# Altium PCB GripperBottomBoard.PcbDoc (part 1 of 4)
Units mm, origin at the board's own origin, x right, y up, seen from the top; angles counter-clockwise.
Board outline 79.5 x 85 mm, 6 copper layers (Top Layer, GND 01, SIG 01, PWR, GND 02, Bottom Layer), stack 1.705 mm thick; 155 components, 93 nets, 613 pads, 240 vias.
Unrouted connection lines stored in the file: 155.
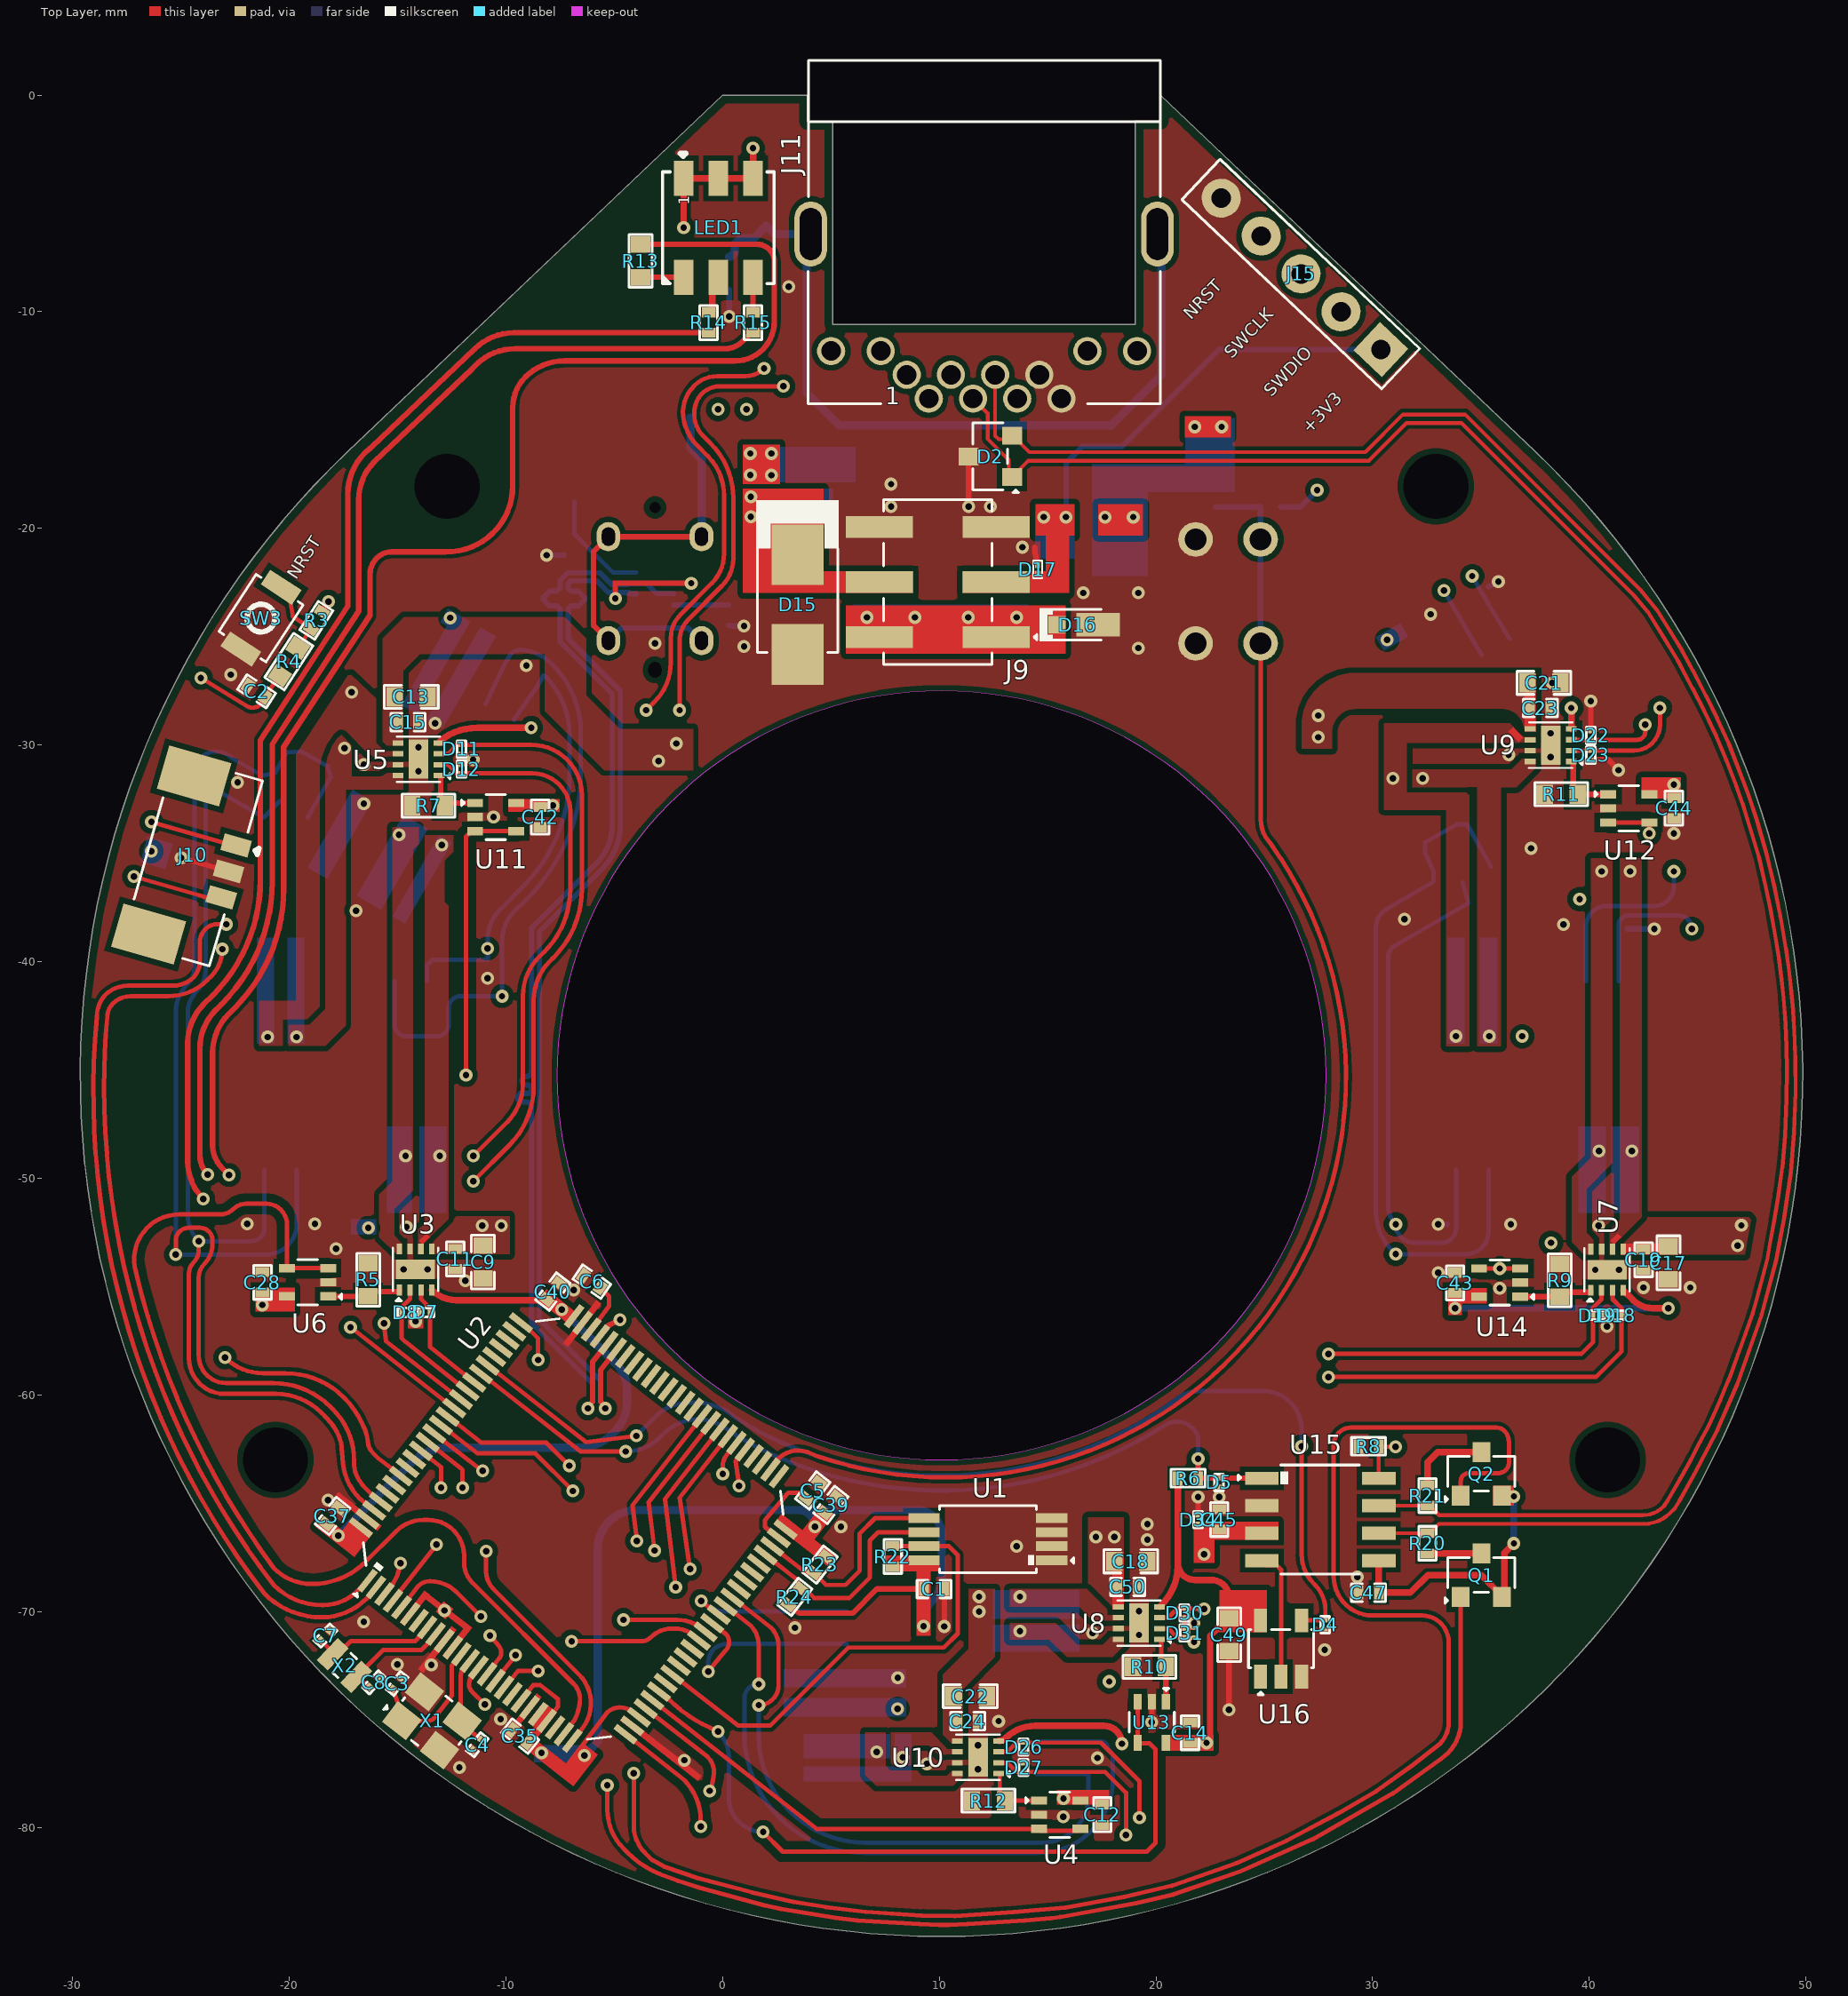
[diagram p0: Top Layer view]
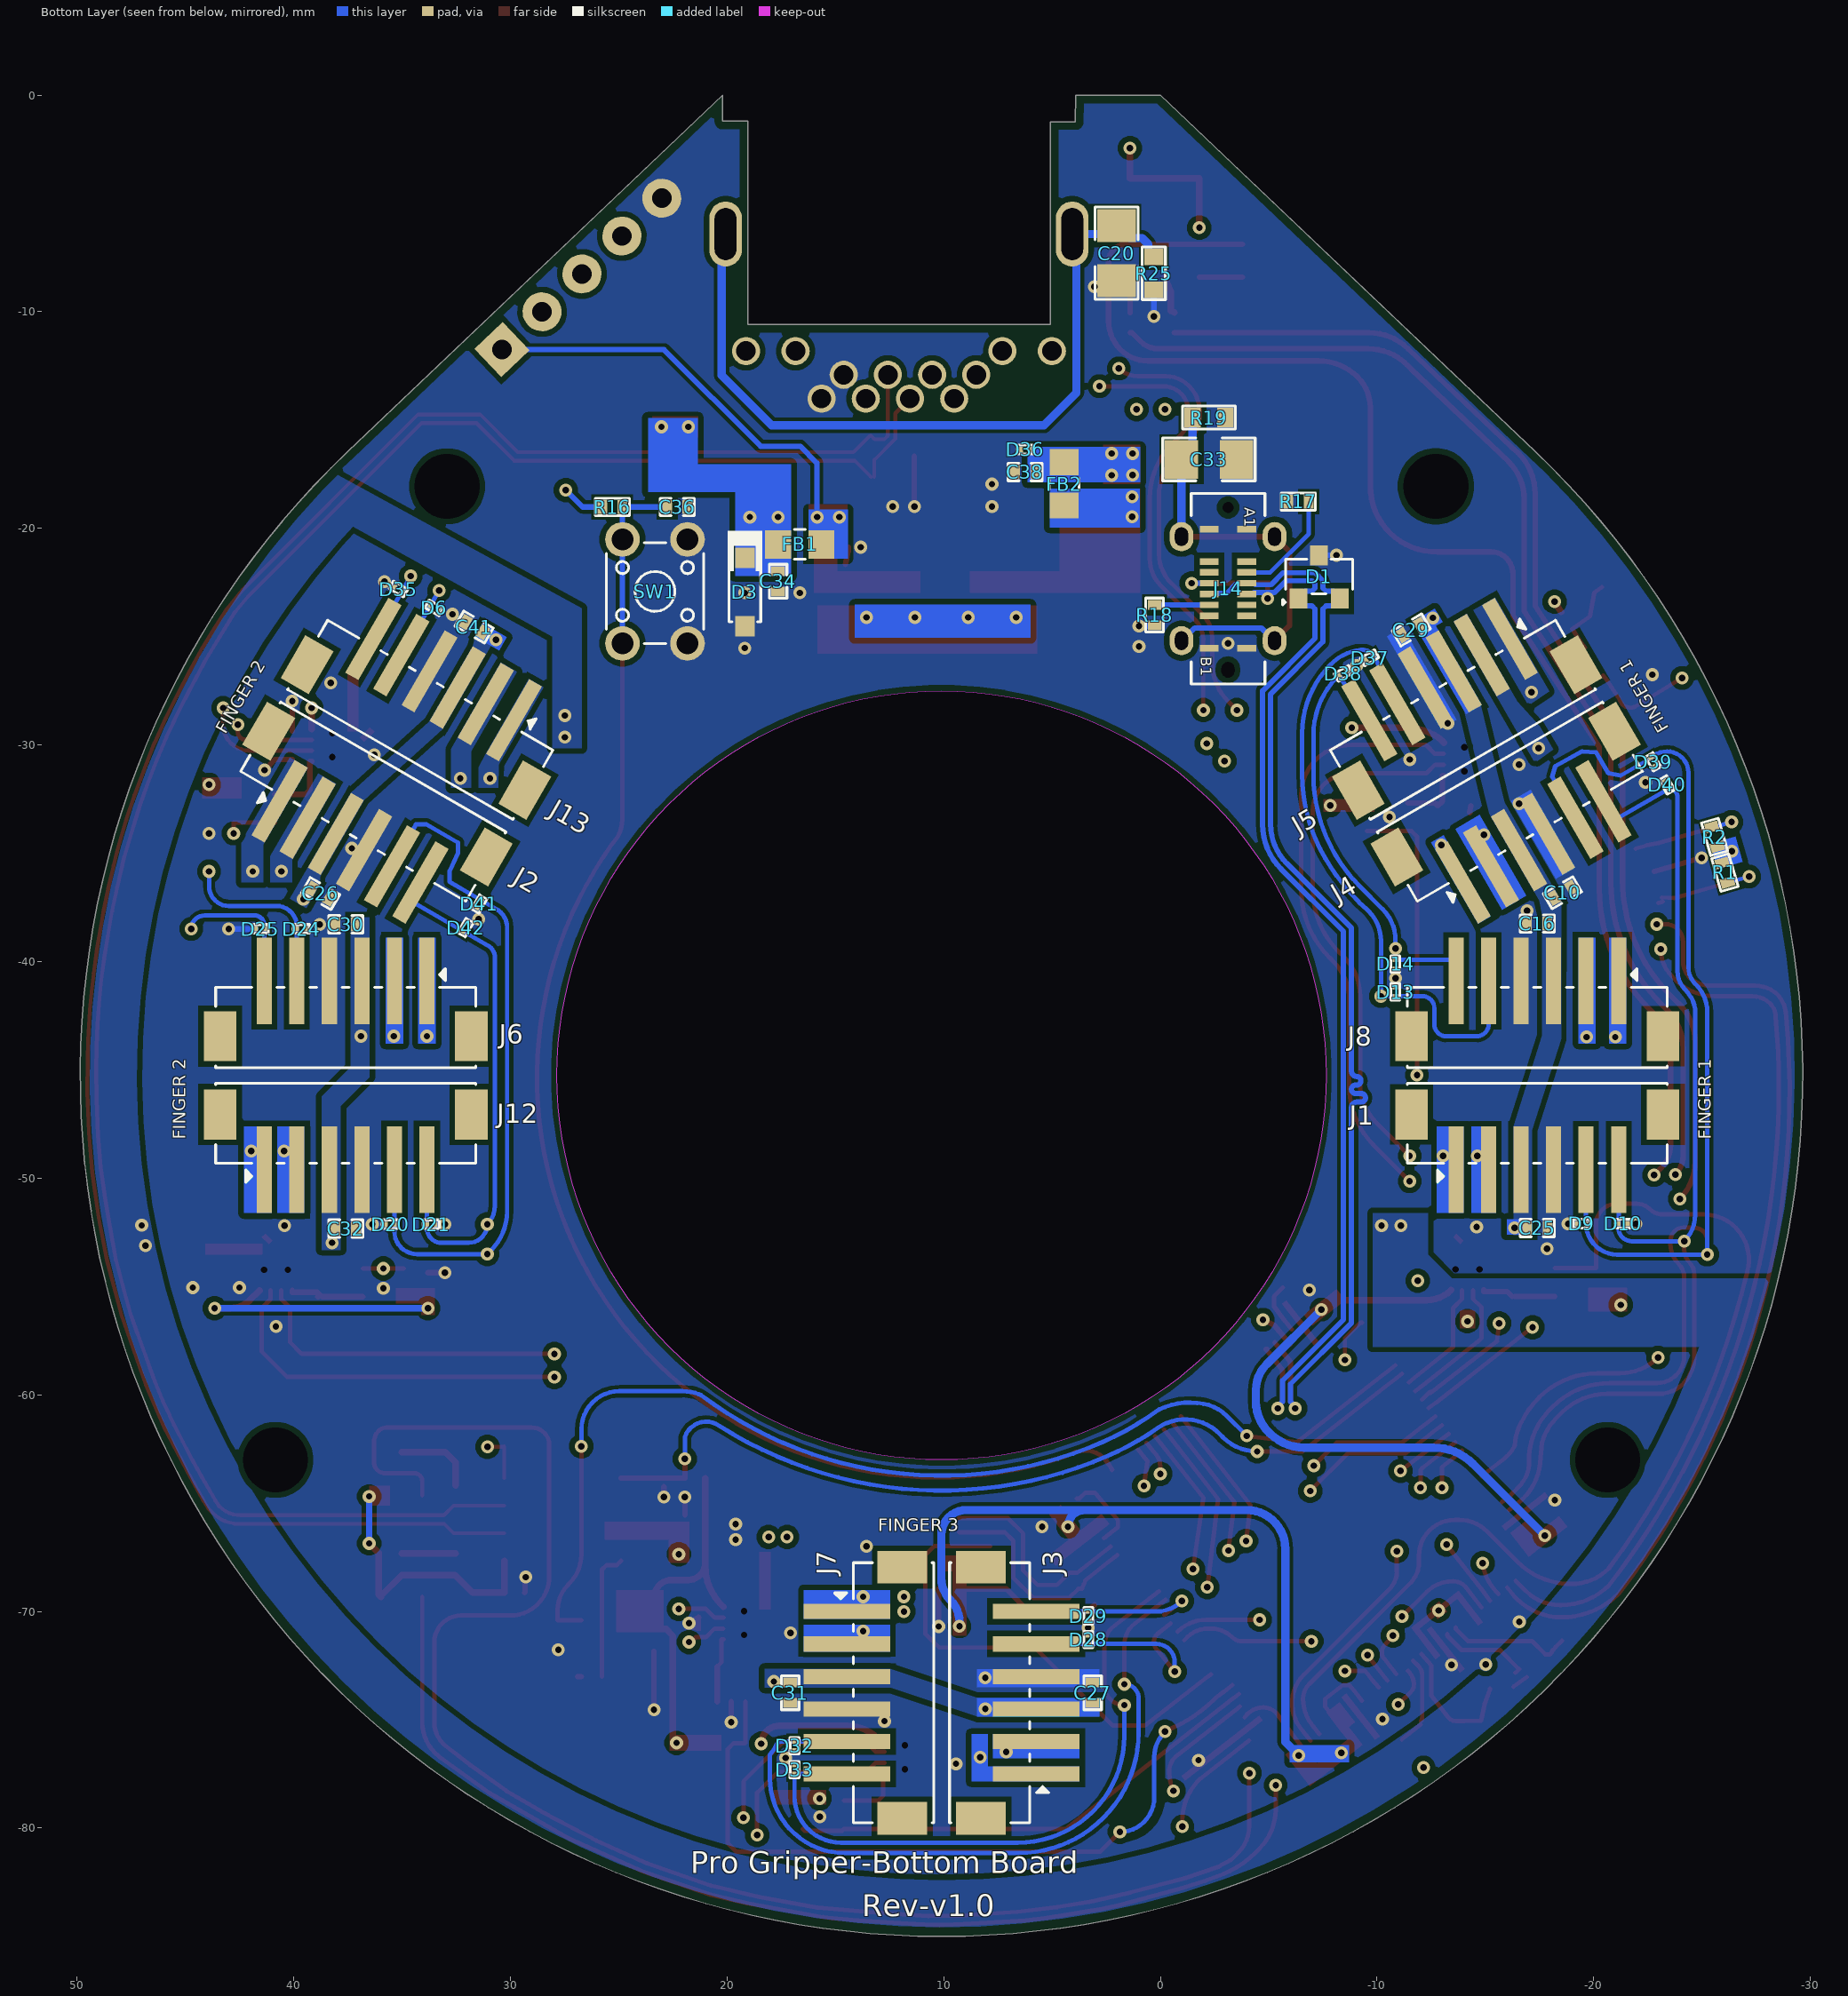
[diagram p1: Bottom Layer view, seen from below]
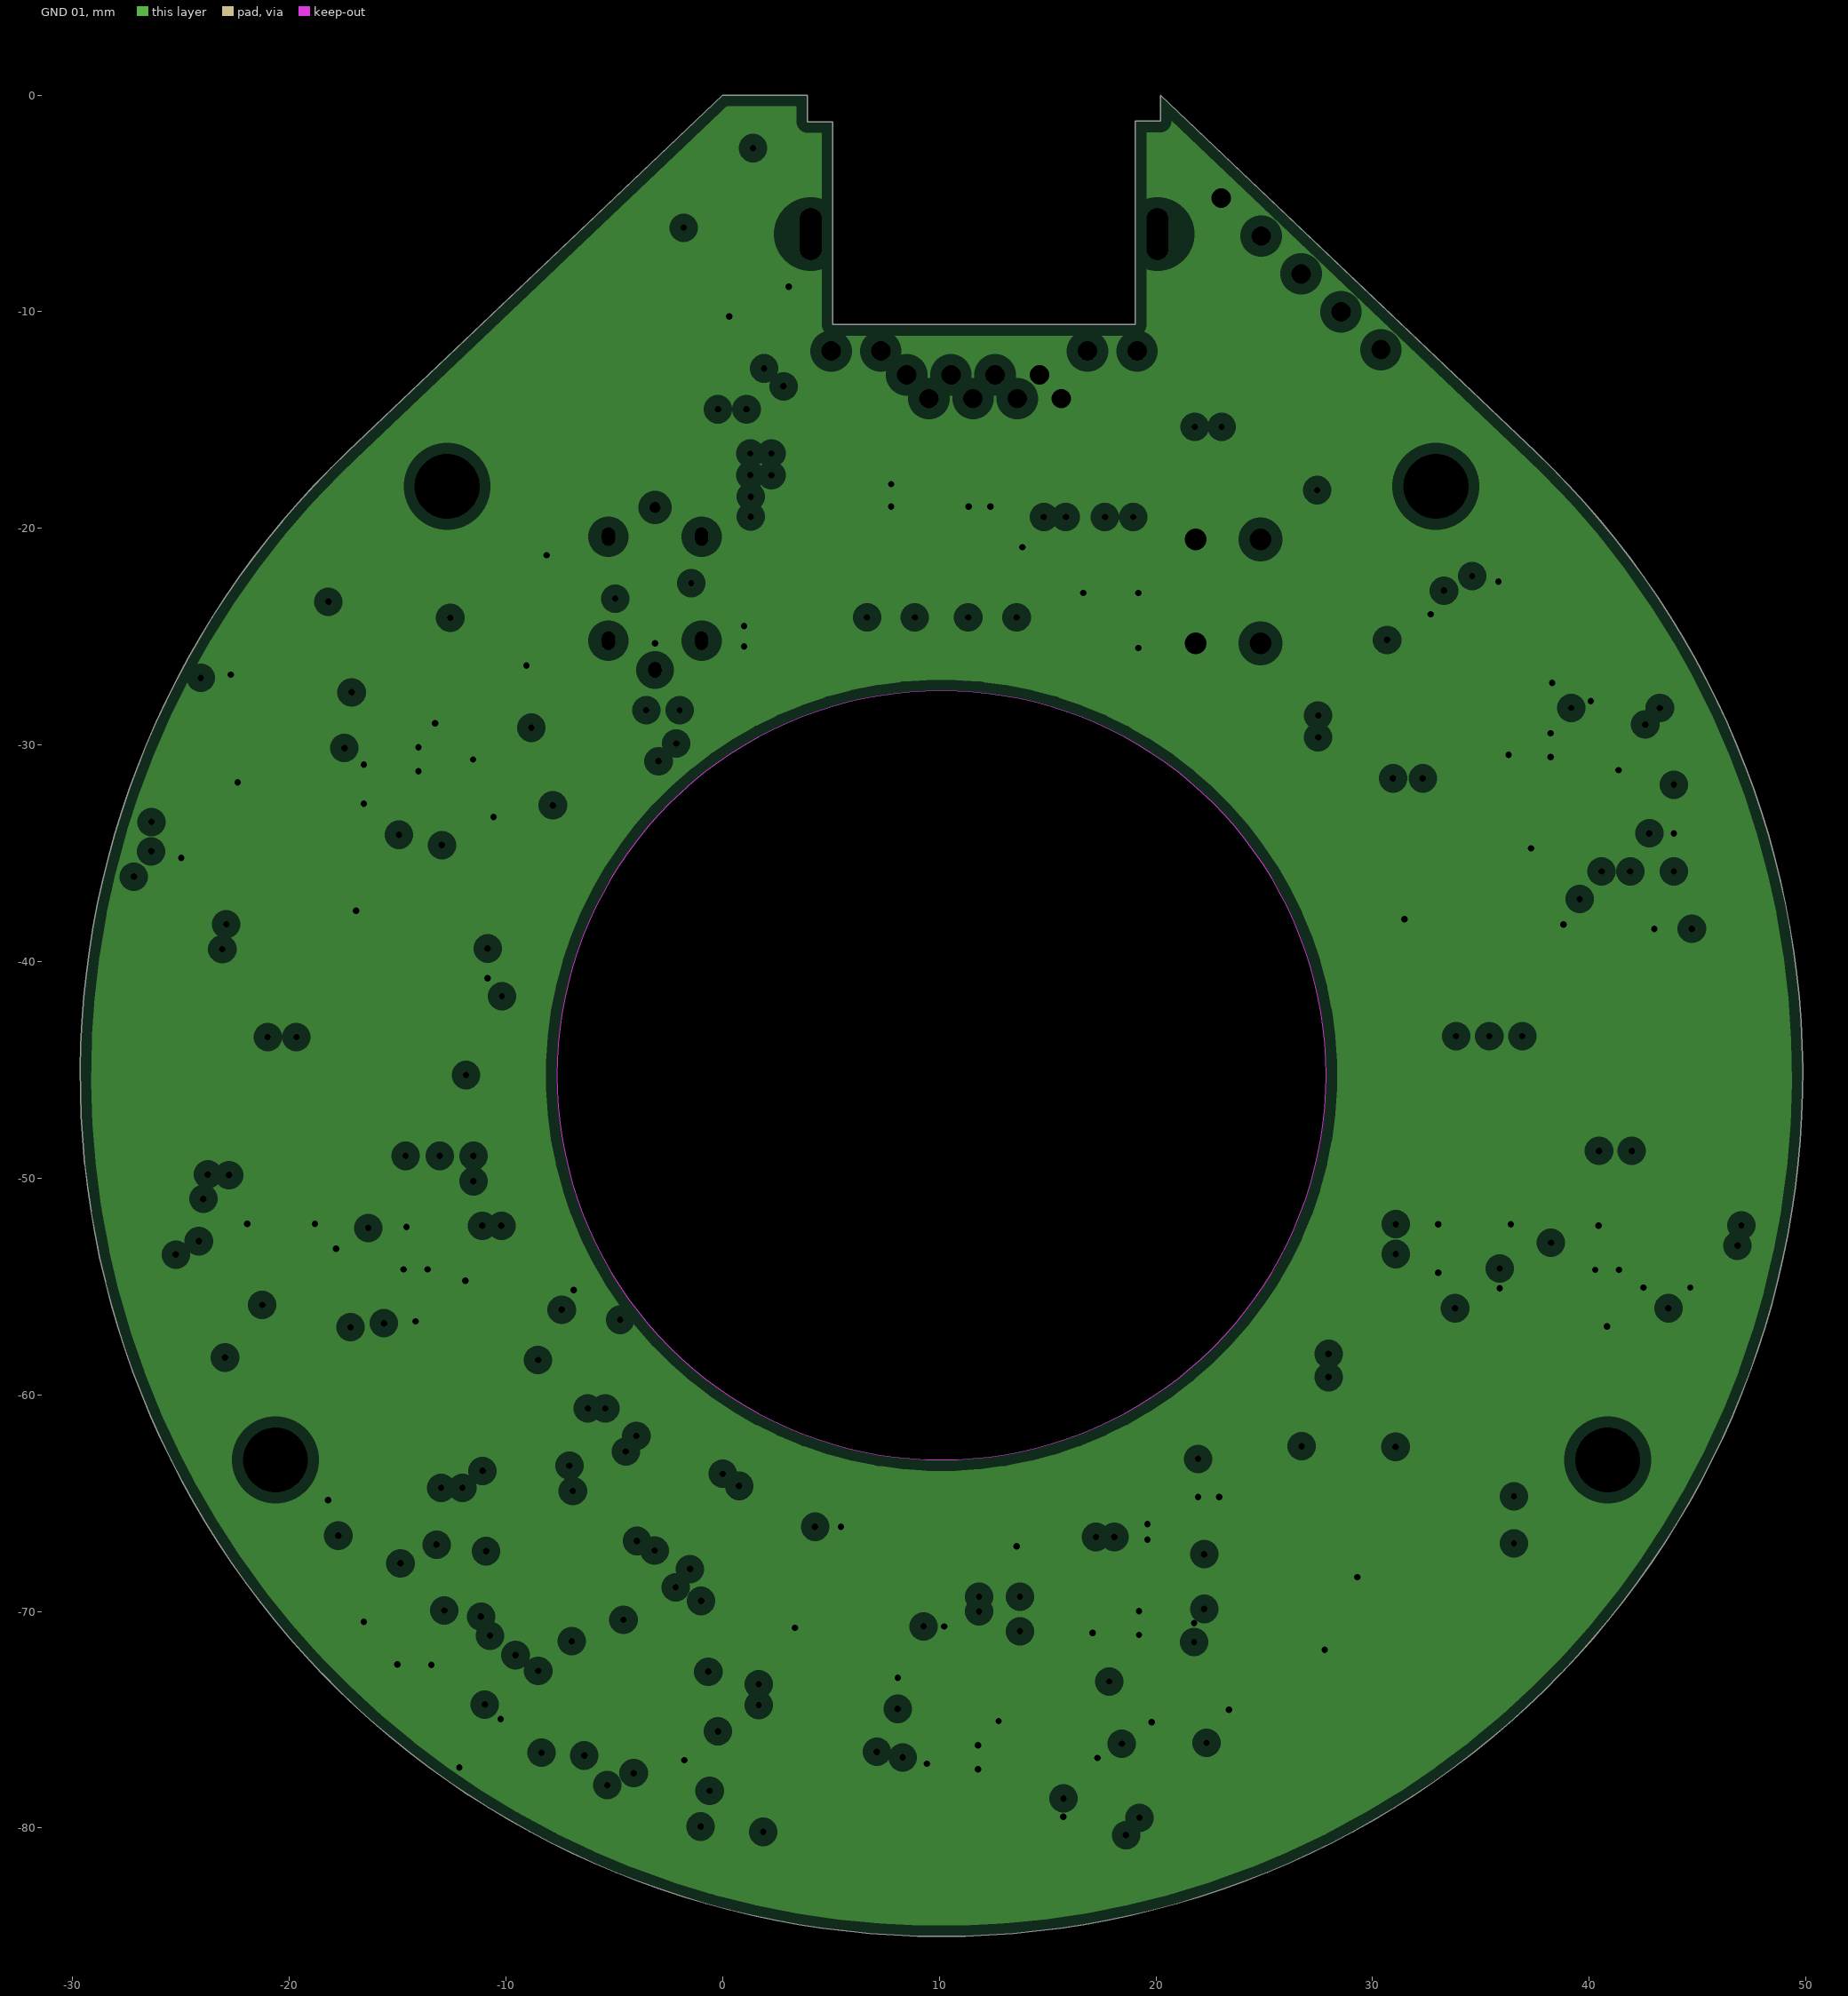
[diagram p2: GND 01, clearances drawn from the general rule]
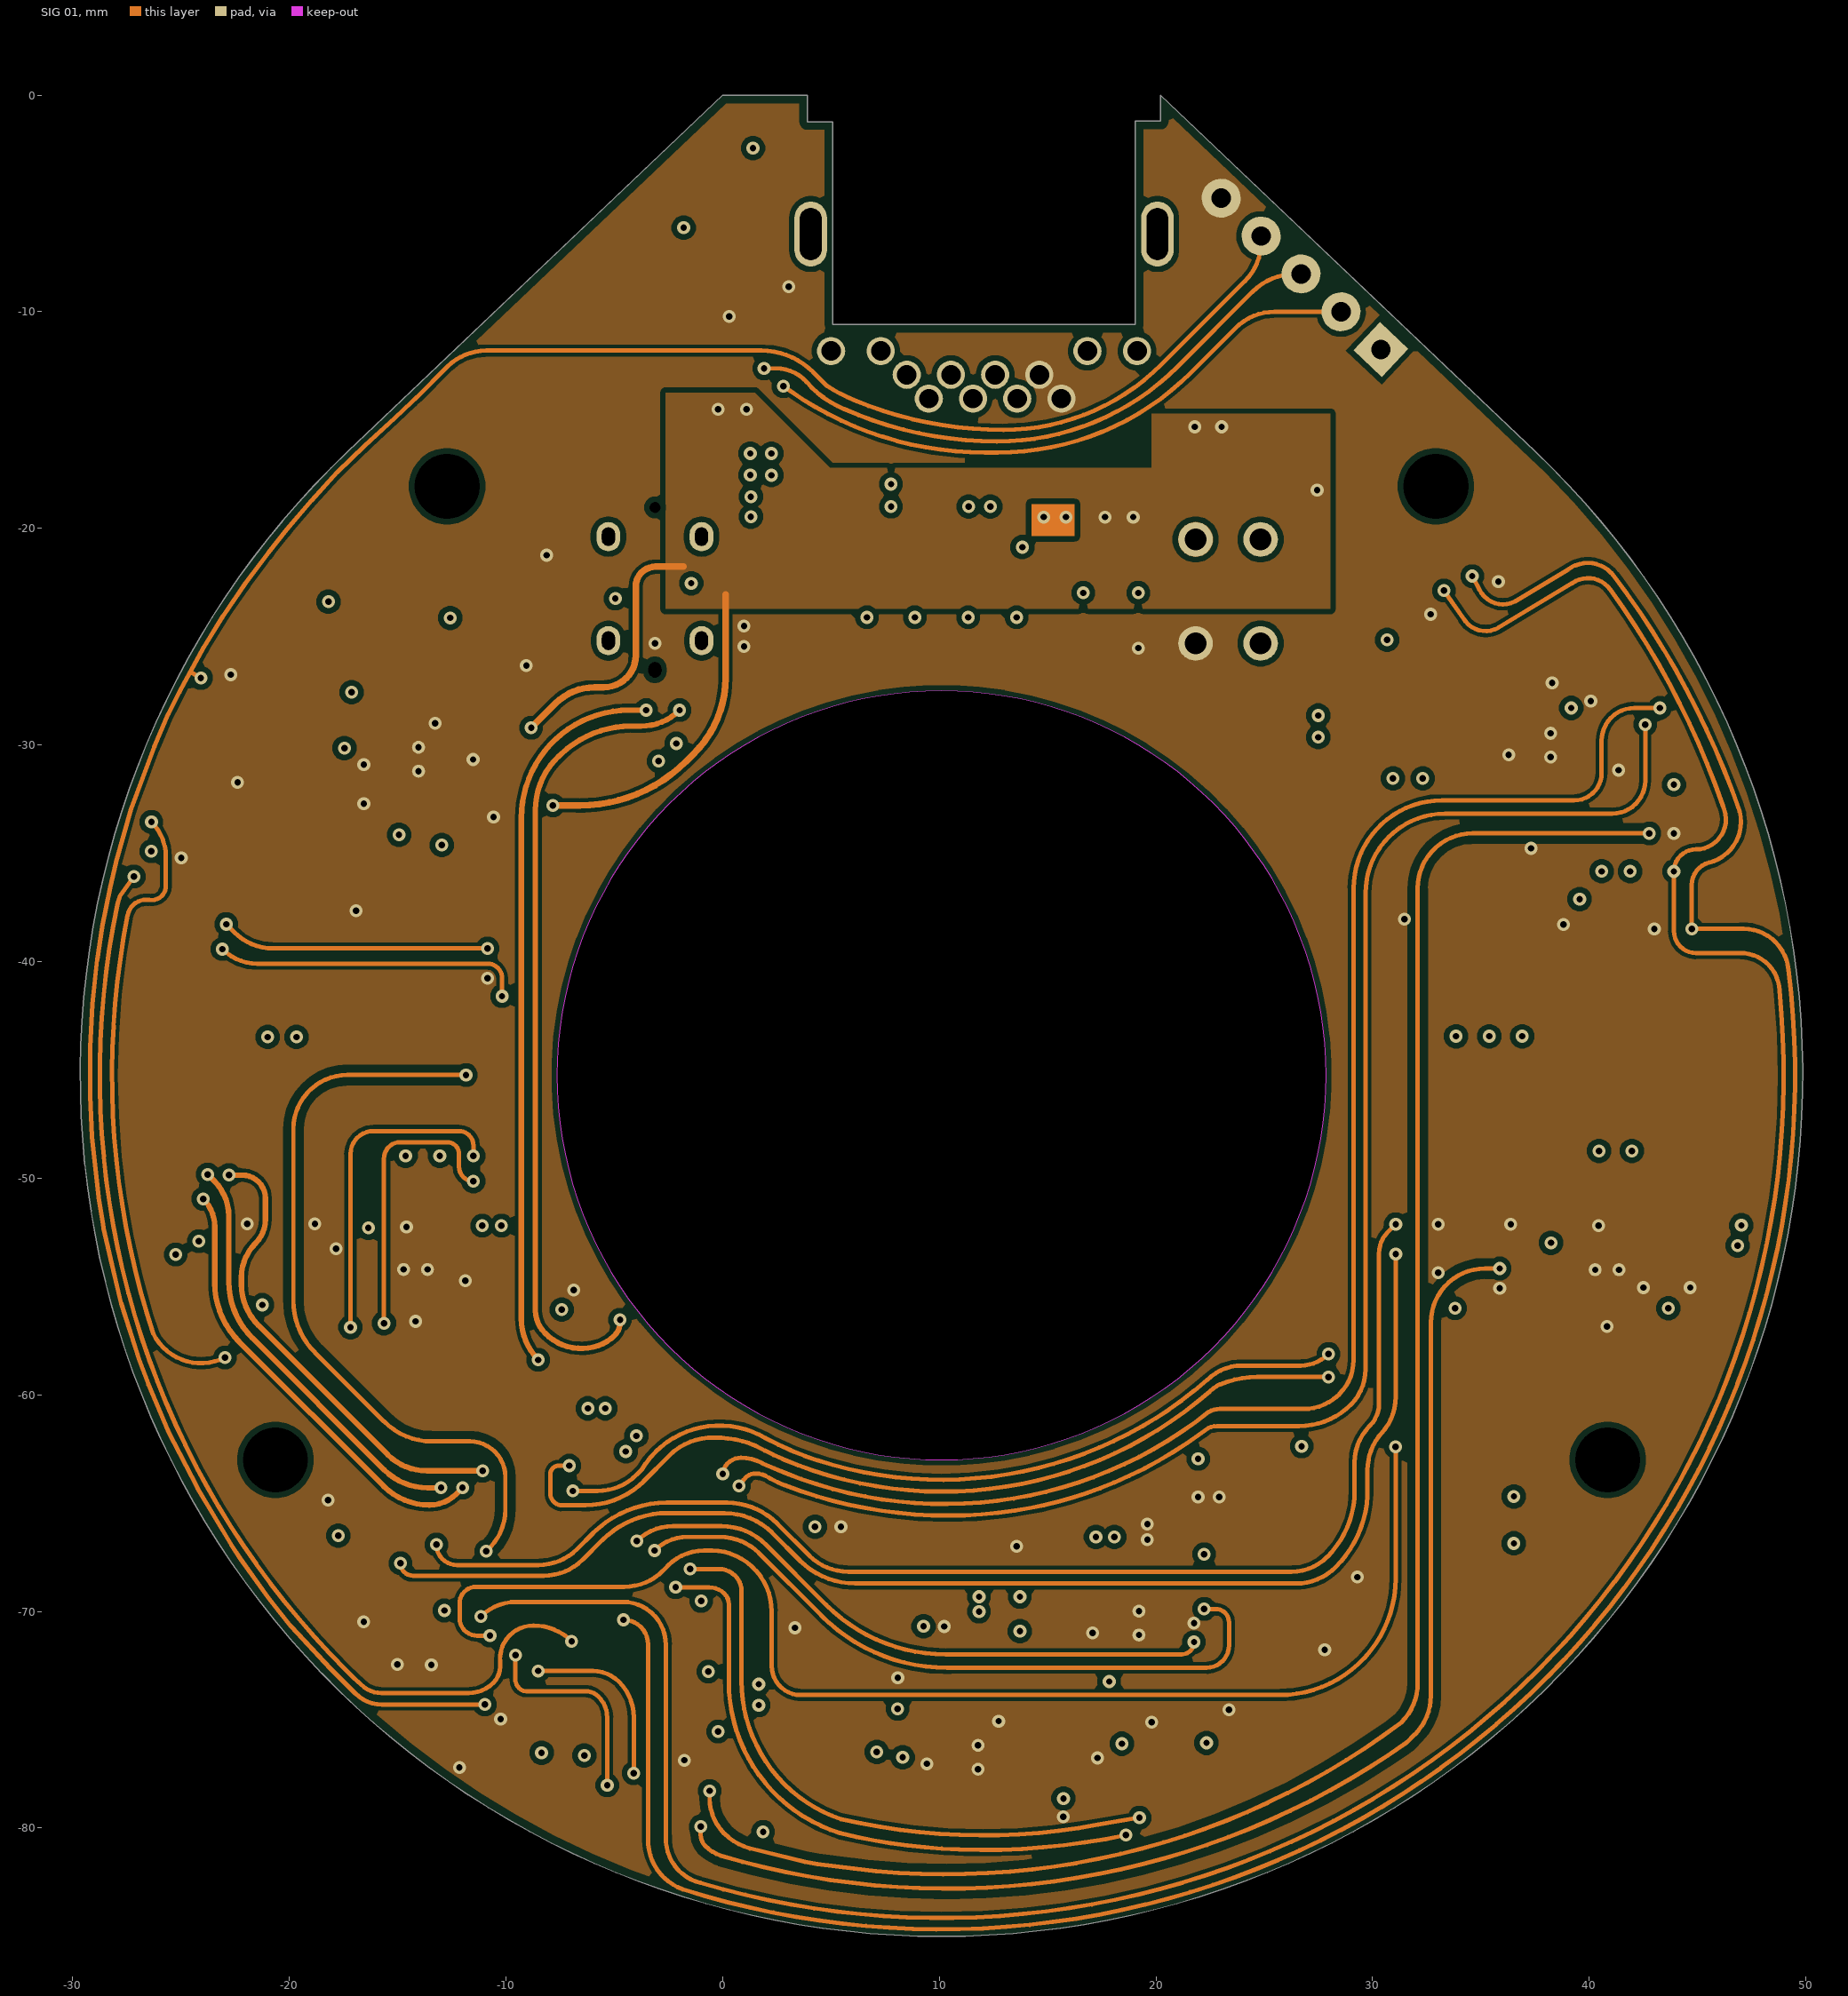
[diagram p3: SIG 01]
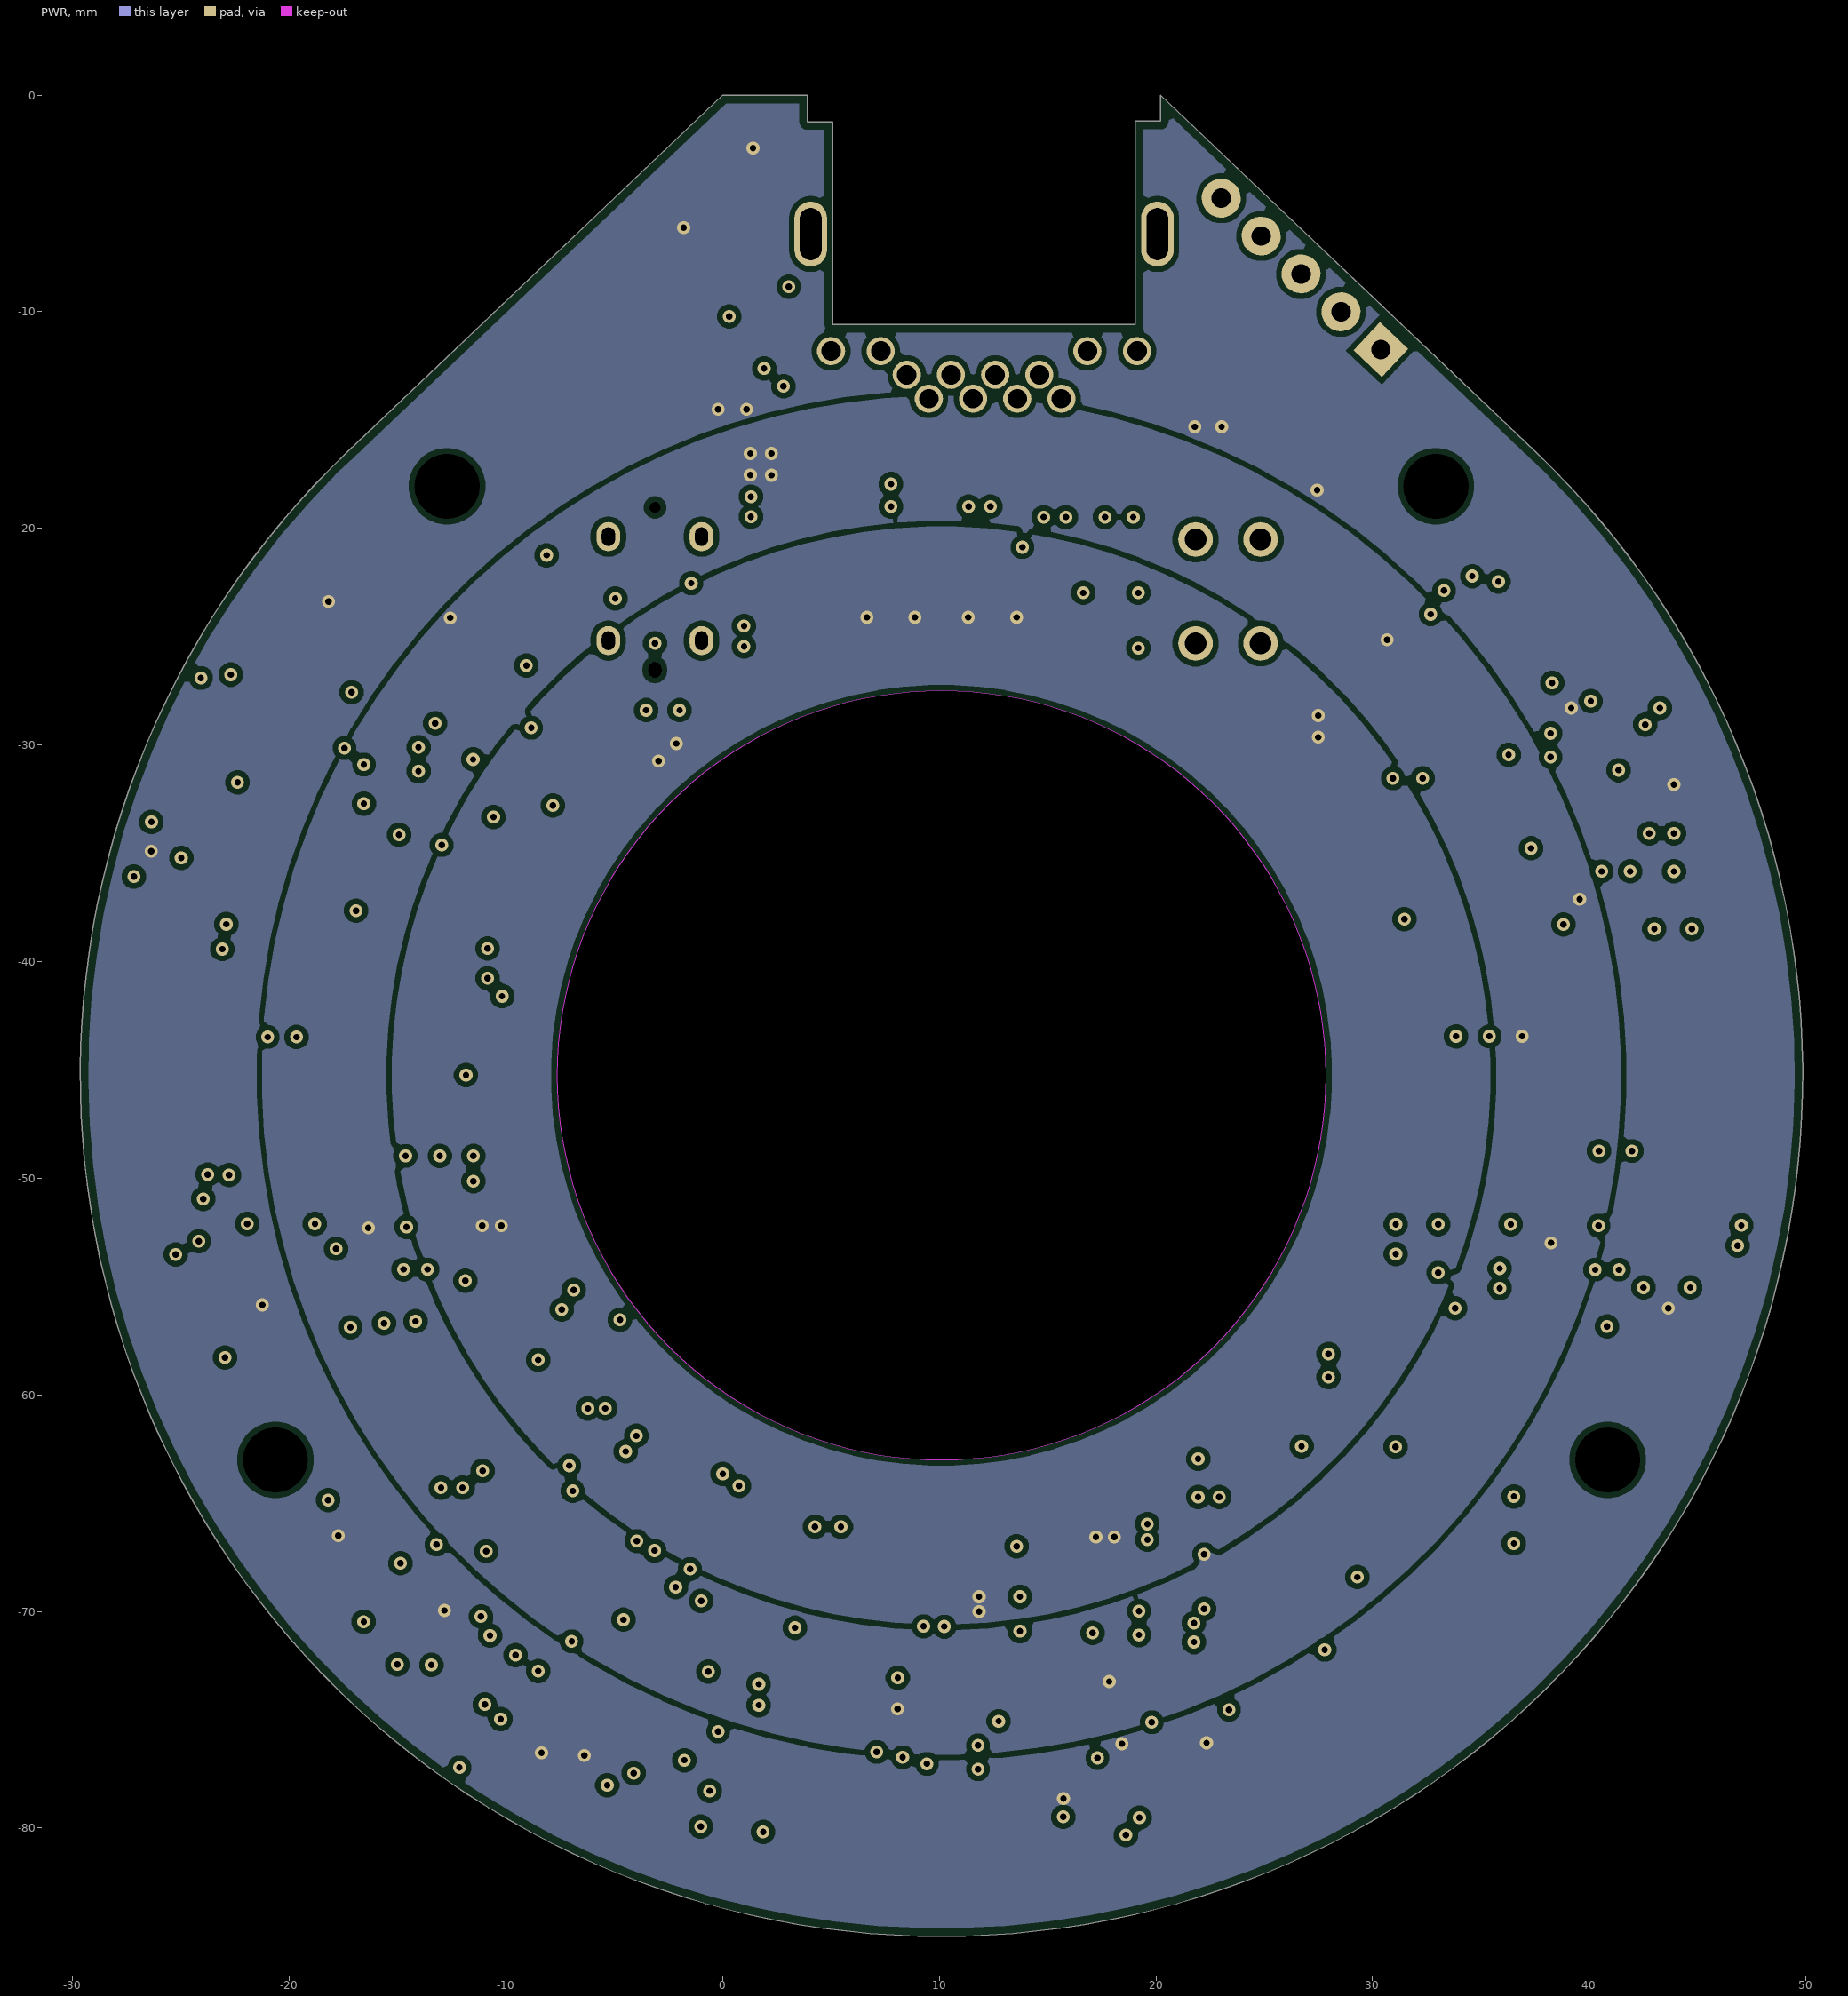
[diagram p4: PWR]
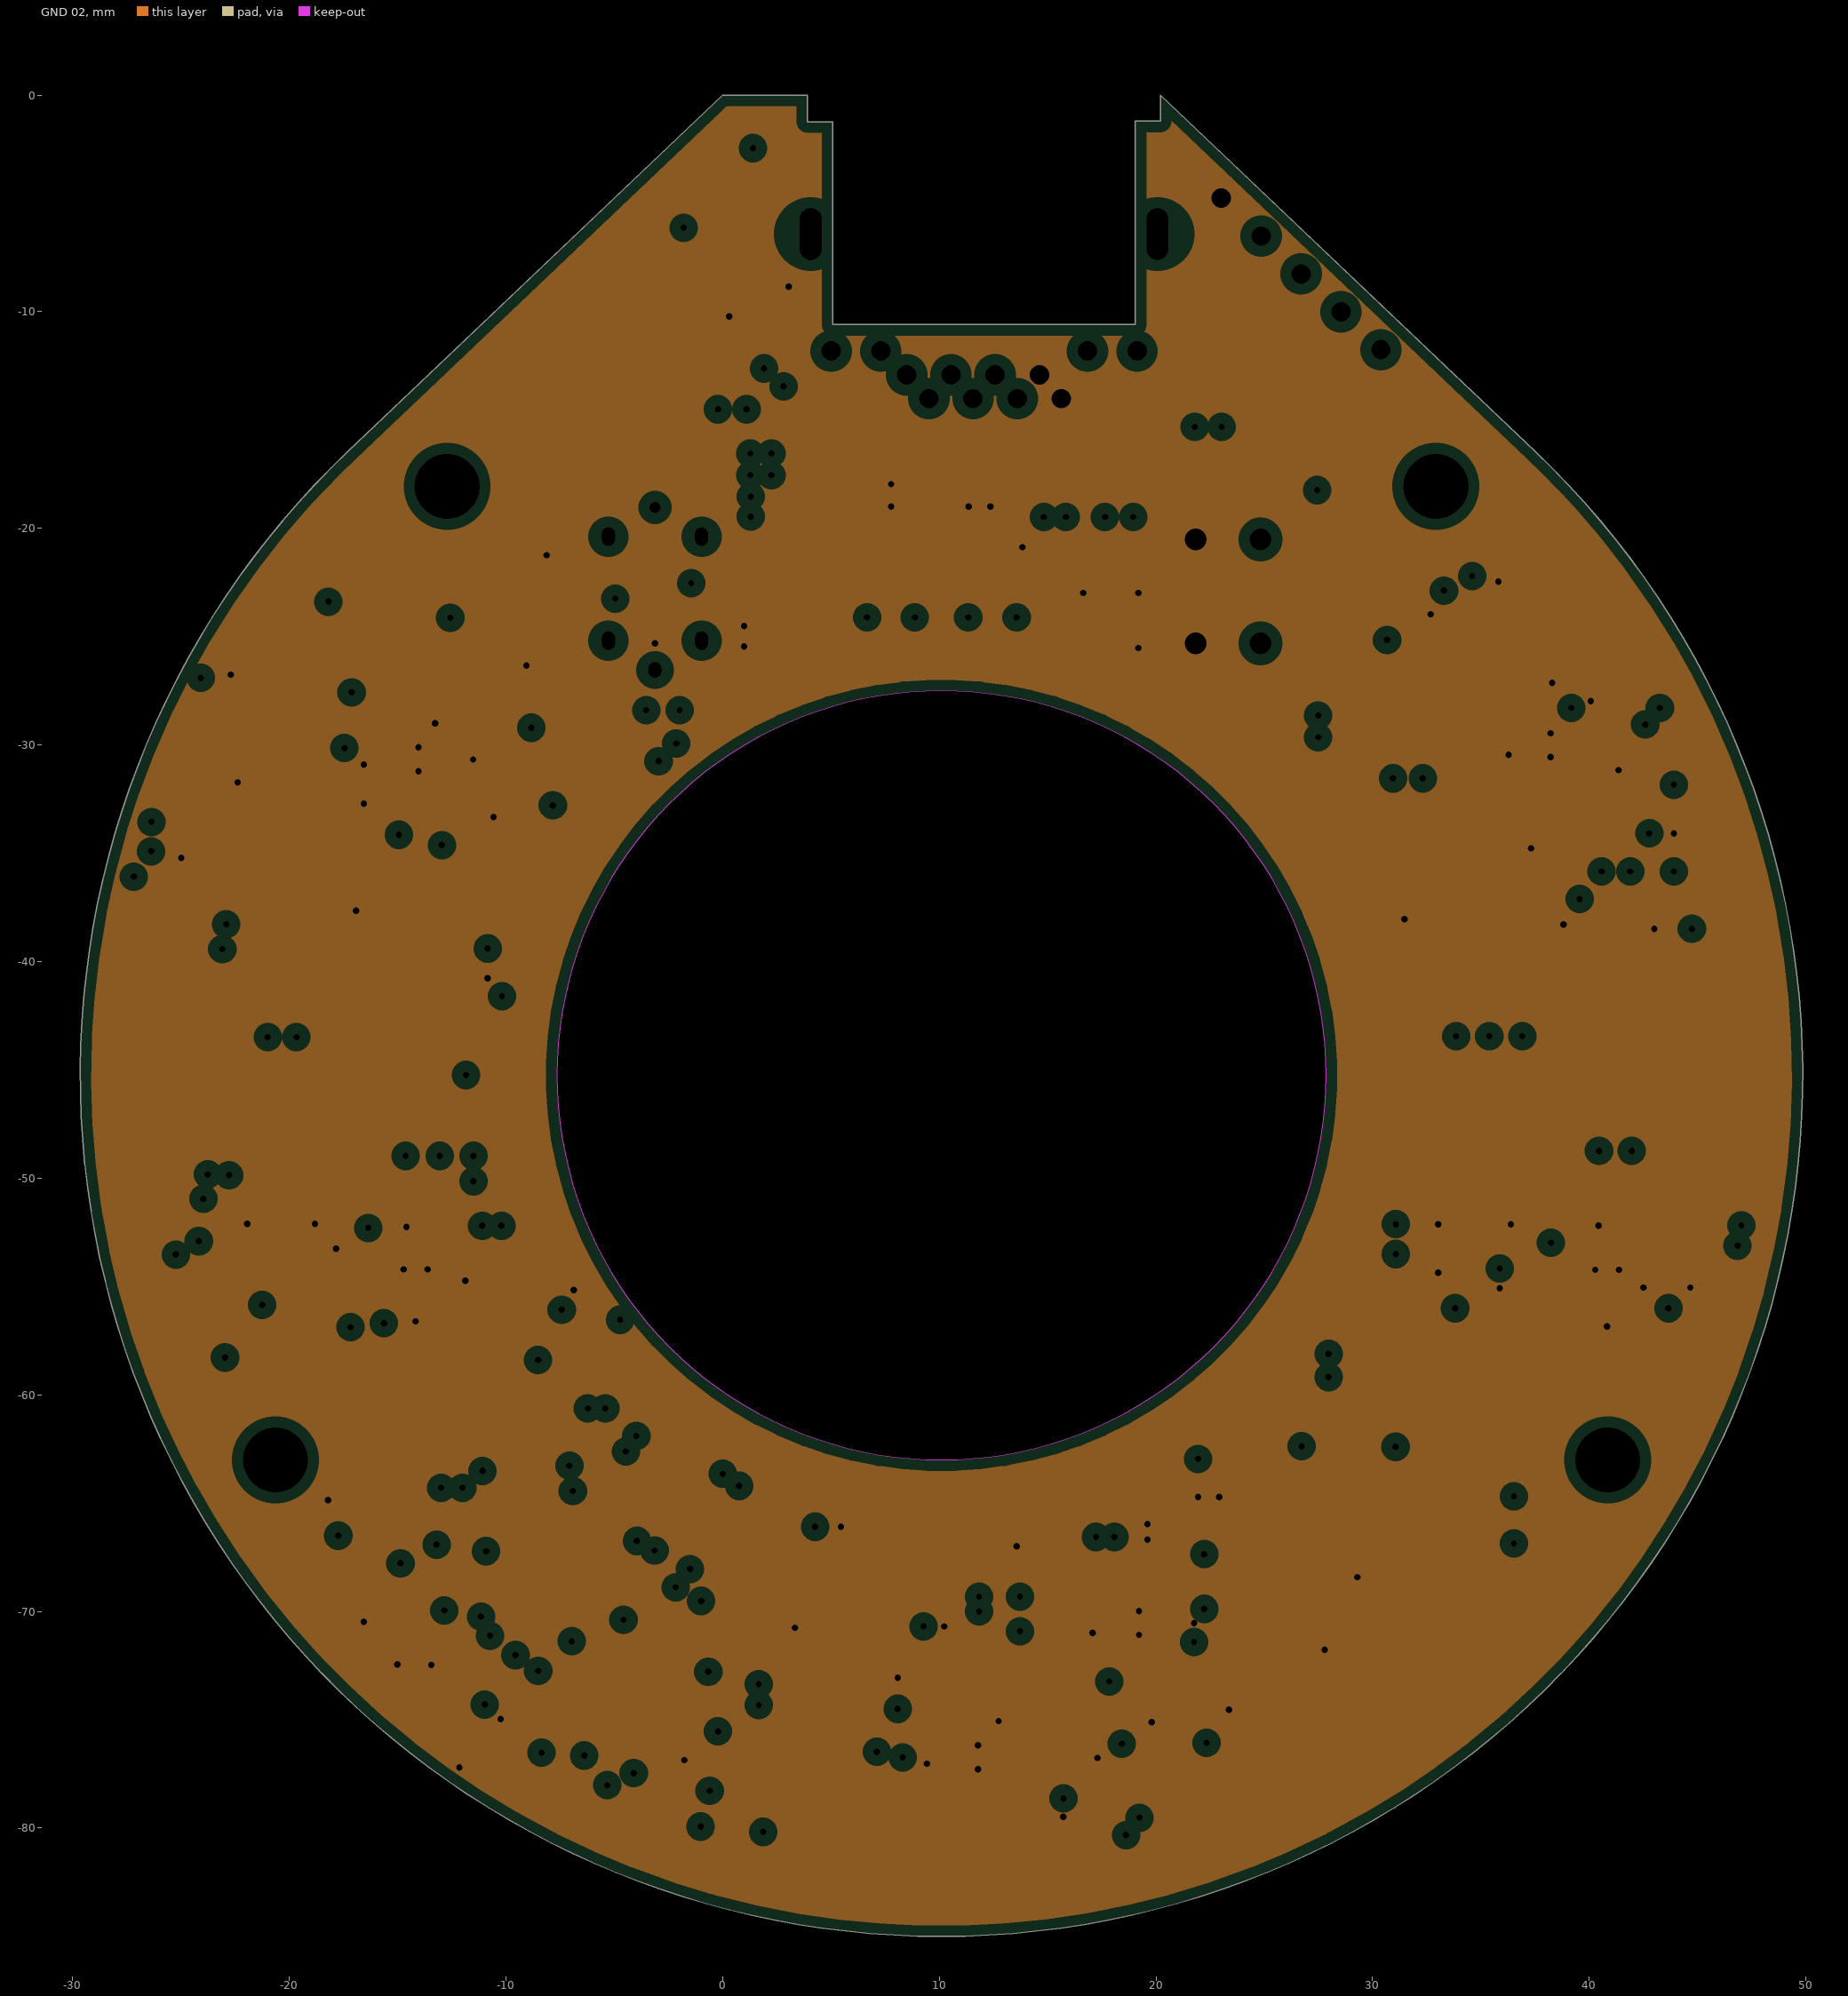
[diagram p5: GND 02, clearances drawn from the general rule]
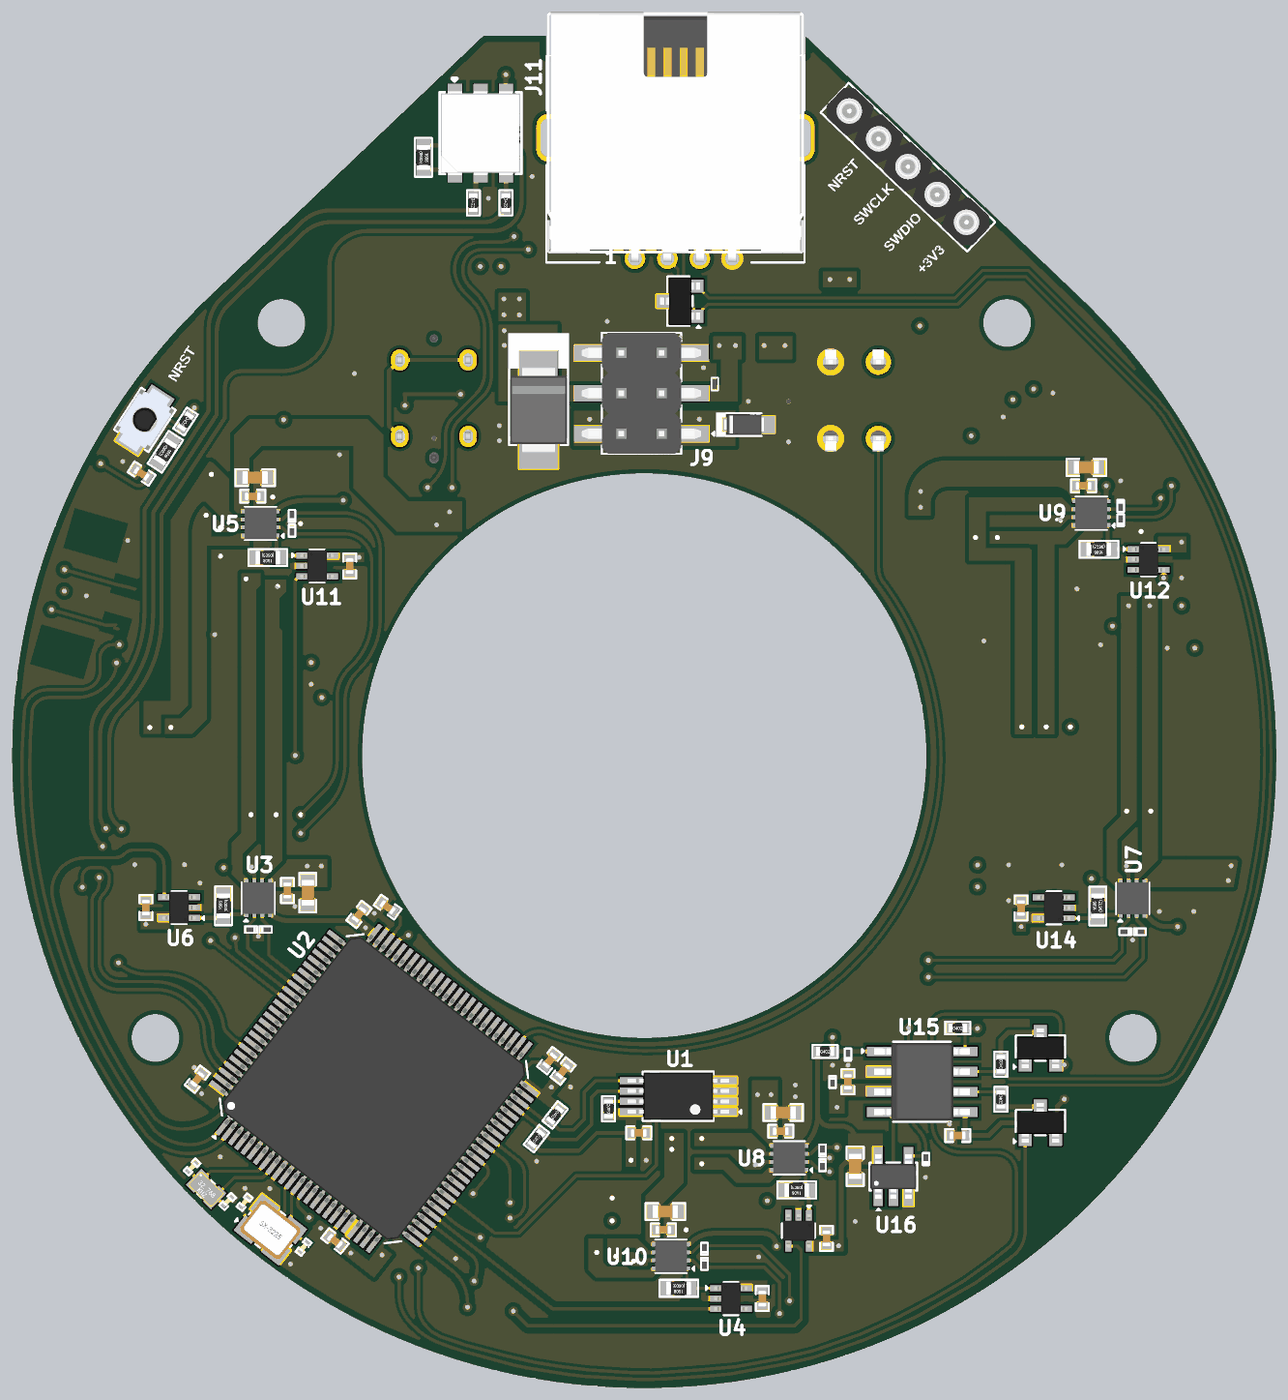
[diagram p8: 3D render of the assembled board from above, using the file's embedded part models]
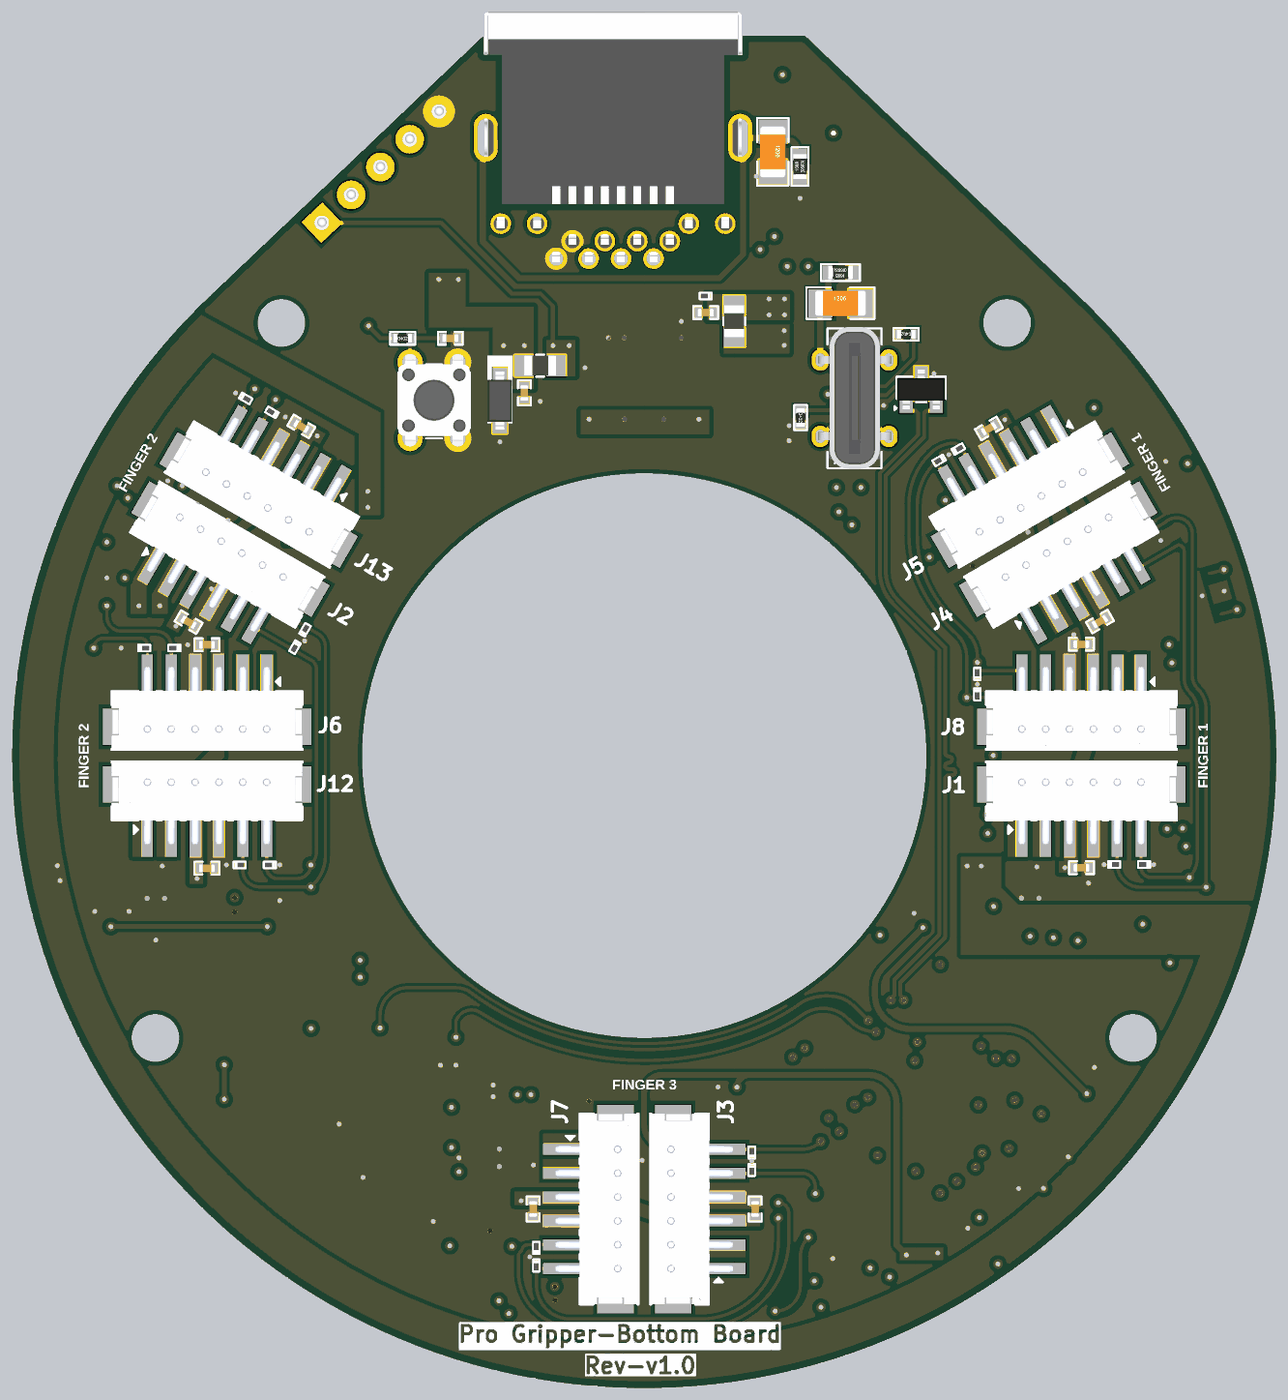
[diagram p9: 3D render of the assembled board from below, using the file's embedded part models]

## Layer stack, top to bottom
Top Solder: solder mask 0.0127, Solder Resist, Dk 3.5
Top Layer: signal copper 0.035
Dielectric 2: prepreg 0.203, PP-006, Dk 4.1
GND 01: plane copper 0.03, net GND
Dielectric 4: core 0.25, PP-006, Dk 4.1
SIG 01: signal copper 0.03
Dielectric 1: prepreg 0.609, FR-4, Dk 4.8
PWR: signal copper 0.03
Dielectric 5: core 0.25, PP-006, Dk 4.1
GND 02: plane copper 0.03, net GND
Dielectric 3: prepreg 0.203, PP-006, Dk 4.1
Bottom Layer: signal copper 0.035
Bottom Solder: solder mask 0.0127, Solder Resist, Dk 3.5

## Board outline
-17.293,-16.446 0,0 3.913,0 3.918,-1.228 5.081,-1.228 5.081,-10.593 19.048,-10.593 19.048,-1.203 20.202,-1.203 20.202,0 37.495,-16.446 cw(c10.101,-45.25)
cut-out: -7.649,-45.25 ccw(c10.101,-45.25) 10.101,-63 ccw(c10.101,-45.25) 27.851,-45.25 ccw(c10.101,-45.25) 10.101,-27.5 ccw(c10.101,-45.25)

## Design rules (kind name [scope] priority, off if disabled: settings)
BoardOutlineClearance [All] p1: gap=0 ignorepadtopadclearanceinfootprint=FALSE except(0.381: Poly-OutlineEdge)
Clearance "ADC lines clearance" [InNet('ADC_1')or InNet('ADC_2') or InNet('ADC_3') or InNet('ADC_4') or InNet('ADC_5') or InNet('ADC_6')] p1: gap=0.254 ignorepadtopadclearanceinfootprint=TRUE except(0.102: SMDPad-Fill; 0.127: Arc-Arc Arc-Track Arc-SMDPad Track-Track Track-SMDPad; 0.152: SMDPad-THPad; 0.178: Arc-Fill Arc-Region Track-Fill Track-Region SMDPad-SMDPad THPad-THPad Fill-Fill; 0.203: Arc-Via Track-Via SMDPad-Via THPad-Via Via-Via; 0.381: Arc-Poly Track-Poly)
Clearance [All] p2: gap=0.254 ignorepadtopadclearanceinfootprint=TRUE except(0.102: SMDPad-Fill; 0.127: Arc-Arc Arc-Track Arc-SMDPad Track-Track Track-SMDPad; 0.152: SMDPad-THPad; 0.178: Arc-Fill Arc-Poly Arc-Region Track-Fill Track-Poly Track-Region SMDPad-SMDPad THPad-THPad Fill-Fill; 0.203: Arc-Via Track-Via SMDPad-Via THPad-Via Via-Via)
DiffPairsRouting [InDifferentialPairClass('USB_Lines')] p1: maxlimit=0.127 minlimit=0.127 mostfreqgap=0.127 toplayer_minwidth=0.241 toplayer_maxwidth=0.241 toplayer_prefwidth=0.241 midlayer3_minwidth=0.126 midlayer3_maxwidth=0.126 midlayer3_prefwidth=0.129 midlayer4_minwidth=0.126 midlayer4_maxwidth=0.126 midlayer4_prefwidth=0.129 bottomlayer_minwidth=0.241 bottomlayer_maxwidth=0.241 bottomlayer_prefwidth=0.241 impedanceprofiledriven=TRUE impedanceprofileid={38195C89-9114-4E53-8DAE-C53E7C45E6F6} impedanceprofilevalue=90.000000 maxuncoupledlength=12.7
HoleSize [All] p1: absolutevalues=TRUE maxlimit=3.048 minlimit=0.025 maxpercent=80.000 minpercent=20.000
MatchedLengths "Schematic Matched Net Lengths_1" [InNetClass('USB')] p1: tolerance=0.635 checknetsindiffpair=TRUE checkdiffpairvsdiffpair=FALSE checkxsignals=FALSE checkothers=FALSE
MaxMinImpedance "Schematic Impedance Constraint" [InNetClass('USB')] p1: minimum=88.00 maximum=90.00
MinimumSolderMaskSliver [All] p1: minsoldermaskwidth=0
PlaneClearance [All] p1: clearance=0.508
PlaneConnect [All] p1: planeconnectstyle=Direct reliefexpansion=0.508 reliefentries=4 reliefconductorwidth=0.254 reliefairgap=0.254
PolygonConnect [All] p1: connectstyle=Direct reliefconductorwidth=0.254 reliefentries=4 polygonreliefangle="90 Angle" airgapwidth=0.254
RoutingVias [All] p1: holewidth=0.3 width=0.6 viastyle="Through Hole" minholewidth=0.3 minwidth=0.6 maxholewidth=0.3 maxwidth=0.6
SilkToSilkClearance [All] p1: silktosilkclearance=0
SilkToSolderMaskClearance [IsPad] p1: minsilkscreentomaskgap=0 clearancetoexposedcopper=TRUE
SolderMaskExpansion Via [isvia] p1: expansion=0.102 istentingtop=TRUE
SolderMaskExpansion [All] p2: expansion=0.102 istentingtop=FALSE
UnRoutedNet [All] p1: checkbadconnections=TRUE
Width [All] p1: maxlimit=1.016 minlimit=0.152 preferedwidth=0.254 toplayer_prefwidth=0.203 midlayer3_minwidth=0.203 midlayer3_maxwidth=0.305 midlayer4_minwidth=0.203 midlayer4_maxwidth=0.305 bottomlayer_prefwidth=0.203 minimp=50.000000 maximp=50.000000 favimp=50.000000
22 further rules are at their usual default settings.

## Classes and differential pairs
component class U_Current-Sense-Sheet: C12 C14 C28 C42 C43 C44 U4 U6 U11 U12 U14
component class U_CAN-Sheet: C45 C47 C49 D34 Q1 Q2 R6 R8 R20 R21 U15 U16
component class U_Motor-Driver-Sheet: C9 C11 C13 C15 C17 C18 C19 C21 C22 C23 C24 C50 R5 R7 R9 R10 R11 R12 U3 U5 U7 U9 U10
component class U_Motor-Connector: C10 C16 C25 C26 C27 C29 C30 C31 C32 C38 C41 D36 FB2 J1 J2 J3 J4 J5 J6 J7 J8 J12 J13
component class U_Controller-Sheet: C1 C2 C3 C4 C5 C6 C7 C8 C34 C35 C36 C37 C39 C40 D3 D4 D5 D6 D7 D8 D9 D10 D11 D12 D13 D14 D18 D19 D20 D21 D22 D23 D24 D25 D26 D27 D28 D29 D30 D31 D32 D33 D35 D37 D38 D39 D40 D41 D42 FB1 J10 LED1 R1 R2 R3 R4 R13 R14 R15 R16 R22 R23 R24 SW1 SW3 U1 U2 X1 X2
component class U_Connector-Sheet: C20 C33 D1 D2 D15 D16 D17 J9 J11 J14 J15 R17 R18 R19 R25
differential pair class USB_Lines: USB
net class USB: USB_N USB_P
differential pair USB: +USB_P -USB_N

## Components (designator, comment, footprint, x,y, rotation, side; value= is the part's Value field where it differs from the comment)
C1 "0.1uf" Cap-0402 9.761,-68.963 r180 top
C2 "0.1uf" Cap-0402 -21.514,-27.519 r327 top locked
C3 "33pF" Cap-0201 -15.029,-73.321 r232 top
C4 "33pF" Cap-0201 -11.327,-76.148 r52 top
C5 "2.2uF" Cap-0402 4.16,-64.418 r232 top
C6 "2.2uF" Cap-0402 -6.04,-54.769 r325 top
C7 "15pF" Cap-0201 -18.337,-71.114 r226 top
C8 "15pF" Cap-0201 -16.095,-73.27 r226 top
C9 "10uF" Cap-0603 -11.059,-53.871 r90 top
C10 "0.1uf" Cap-0402 -18.561,-36.821 r330 bottom
C11 "0.1uf" Cap-0402 -12.343,-53.73 r90 top
C12 "0.1uf" Cap-0402 17.526,-79.383 r270 top
C13 "10uF" Cap-0603 -14.373,-27.777 r180 top
C14 "0.1uf" Cap-0402 21.566,-75.595 r90 top
C15 "0.1uf" Cap-0402 -14.518,-28.946 r180 top
C16 "0.1uf" Cap-0402 -17.39,-38.247 r180 bottom
C17 "10uF" Cap-0603 43.648,-53.904 r90 top
C18 "10uF" Cap-0603 18.841,-67.686 r180 top
C19 "0.1uf" Cap-0402 42.503,-53.758 r90 top
C20 "4.7nF" Cap-1206 2.017,-7.297 r270 bottom
C21 "10uF" Cap-0603 37.905,-27.133 r180 top
C22 "10uF" Cap-0603 11.43,-73.913 r180 top
C23 "0.1uf" Cap-0402 37.736,-28.292 r180 top
C24 "0.1uf" Cap-0402 11.306,-75.063 r180 top
C25 "0.1uf" Cap-0402 -17.401,-52.295 r0 bottom
C26 "0.1uf" Cap-0402 38.758,-36.858 r30 bottom
C27 "0.1uf" Cap-0402 3.126,-73.75 r270 bottom
C28 "0.1uf" Cap-0402 -21.239,-54.802 r90 top
C29 "0.1uf" Cap-0402 -11.579,-24.689 r150 bottom
C30 "0.1uf" Cap-0402 37.601,-38.285 r180 bottom
C31 "0.1uf" Cap-0402 17.089,-73.75 r90 bottom
C32 "0.1uf" Cap-0402 37.601,-52.327 r0 bottom
C33 "4.7nF" Cap-1206 -2.244,-16.815 r180 bottom
C34 "0.1uf" Cap-0402 17.642,-22.445 r90 bottom
C35 "10uF" Cap-0402 -9.351,-75.754 r322 top
C36 "0.1uf" Cap-0402 22.296,-19.014 r0 bottom
C37 "10uF" Cap-0402 -18.001,-65.59 r232 top
C38 "0.1uf" Cap-0402 6.236,-17.399 r180 bottom
C39 "10uF" Cap-0402 4.996,-65.08 r232 top
C40 "10uF" Cap-0402 -7.837,-55.233 r232 top
C41 "0.1uf" Cap-0402 31.671,-24.557 r210 bottom
C42 "0.1uf" Cap-0402 -8.422,-33.329 r270 top
C43 "0.1uf" Cap-0402 33.806,-54.831 r90 top
C44 "0.1uf" Cap-0402 43.903,-32.916 r270 top
C45 "0.1uf" Cap-0402 22.917,-65.751 r90 top
C47 "0.1uf" Cap-0402 29.813,-69.13 r0 top
C49 "1uF" Cap-0603 23.372,-71.074 r90 top
C50 "0.1uf" Cap-0402 18.686,-68.86 r180 top
D1 "ESD5302F-3/TR" Sot-23 -7.322,-22.241 r180 bottom
D2 "CDSOT23-T24CAN-Q" SOT-23 12.354,-16.678 r90 top
D3 "AZ3003-01G" SOD-123 19.18,-22.939 r90 bottom
D4 "PESD3V3Y1BSFYL" DSN0603-2 27.817,-70.612 r90 top
D5 "PESD3V3Y1BSFYL" DSN0603-2 22.917,-64.046 r90 top
D6 "PESD3V3Y1BSFYL" DSN0603-2 33.52,-23.673 r30 bottom
D7 "PESD3V3Y1BSFYL" DSN0603-2 -13.713,-56.191 r0 top
D8 "PESD3V3Y1BSFYL" DSN0603-2 -14.626,-56.191 r180 top
D9 "PESD3V3Y1BSFYL" DSN0603-2 -19.449,-52.092 r180 bottom
D10 "PESD3V3Y1BSFYL" DSN0603-2 -21.349,-52.092 r0 bottom
D11 "PESD3V3Y1BSFYL" DSN0603-2 -12.056,-30.195 r90 top
D12 "PESD3V3Y1BSFYL" DSN0603-2 -12.056,-31.108 r270 top
D13 "PESD3V3Y1BSFYL" DSN0603-2 -10.849,-41.395 r270 bottom
D14 "PESD3V3Y1BSFYL" DSN0603-2 -10.849,-40.115 r90 bottom
D15 "P6SMB6.8A" SMB_ 3.454,-23.52 r90 top
D16 "MSMP12A-M3/89A" MicroSMP 16.383,-24.445 r180 top
D17 "ESDM2033MX4T5G" DFN-2(0.3x0.6) 14.539,-21.899 r270 top
D18 "PESD3V3Y1BSFYL" DSN0603-2 41.274,-56.326 r0 top
D19 "PESD3V3Y1BSFYL" DSN0603-2 40.363,-56.327 r180 top
D20 "PESD3V3Y1BSFYL" DSN0603-2 35.551,-52.124 r180 bottom
D21 "PESD3V3Y1BSFYL" DSN0603-2 33.651,-52.124 r0 bottom
D22 "PESD3V3Y1BSFYL" DSN0603-2 40.067,-29.56 r270 top
D23 "PESD3V3Y1BSFYL" DSN0603-2 40.067,-30.465 r90 top
D24 "PESD3V3Y1BSFYL" DSN0603-2 39.651,-38.488 r0 bottom
D25 "PESD3V3Y1BSFYL" DSN0603-2 41.551,-38.488 r180 bottom
D26 "PESD3V3Y1BSFYL" DSN0603-2 13.889,-76.253 r90 top
D27 "PESD3V3Y1BSFYL" DSN0603-2 13.889,-77.206 r270 top
D28 "PESD3V3Y1BSFYL" DSN0603-2 3.329,-71.3 r270 bottom
D29 "PESD3V3Y1BSFYL" DSN0603-2 3.329,-70.2 r90 bottom
D30 "PESD3V3Y1BSFYL" DSN0603-2 21.316,-70.073 r90 top
D31 "PESD3V3Y1BSFYL" DSN0603-2 21.316,-70.991 r270 top
D32 "PESD3V3Y1BSFYL" DSN0603-2 16.885,-76.2 r90 bottom
D33 "PESD3V3Y1BSFYL" DSN0603-2 16.885,-77.3 r270 bottom
D34 "PESD5V0H1BSFYL" DSN0603-2 21.946,-65.761 r270 top
D35 "PESD3V3Y1BSFYL" DSN0603-2 35.168,-22.797 r210 bottom
D36 "PESD5V0H1BSFYL" DSN0603-2 6.236,-16.357 r0 bottom
D37 "PESD3V3Y1BSFYL" DSN0603-2 -9.656,-25.976 r150 bottom
D38 "PESD3V3Y1BSFYL" DSN0603-2 -8.445,-26.696 r330 bottom
D39 "PESD3V3Y1BSFYL" DSN0603-2 -22.74,-30.779 r60 bottom
D40 "PESD3V3Y1BSFYL" DSN0603-2 -23.38,-31.836 r240 bottom
D41 "PESD3V3Y1BSFYL" DSN0603-2 31.436,-37.344 r120 bottom
D42 "PESD3V3Y1BSFYL" DSN0603-2 32.067,-38.433 r300 bottom
FB1 "BLM21PG220SN1D" Ind-0805 16.645,-20.74 r0 bottom
FB2 "BLM21PG220SN1D" Ind-0805 4.439,-17.942 r90 bottom
J1 "B6B-ZR-SM4-TF(LF)(SN)" B6B-ZR-SM4-TF(LF)(SN) -17.399,-48.336 r180 bottom locked
J2 "B6B-ZR-SM4-TF(LF)(SN)" B6B-ZR-SM4-TF(LF)(SN) 36.766,-33.373 r210 bottom
J3 "B6B-ZR-SM4-TF(LF)(SN)" B6B-ZR-SM4-TF(LF)(SN) 7.007,-73.75 r90 bottom
J4 "B6B-ZR-SM4-TF(LF)(SN)" B6B-ZR-SM4-TF(LF)(SN) -16.571,-33.373 r150 bottom locked
J5 "B6B-ZR-SM4-TF(LF)(SN)" B6B-ZR-SM4-TF(LF)(SN) -13.525,-28.082 r330 bottom locked
J6 "B6B-ZR-SM4-TF(LF)(SN)" B6B-ZR-SM4-TF(LF)(SN) 37.601,-42.17 r0 bottom
J7 "B6B-ZR-SM4-TF(LF)(SN)" B6B-ZR-SM4-TF(LF)(SN) 13.186,-73.75 r270 bottom
J8 "B6B-ZR-SM4-TF(LF)(SN)" B6B-ZR-SM4-TF(LF)(SN) -17.399,-42.17 r0 bottom locked
J9 "PZ254-2-03-S" "HDR 2x3 Male SMD 2.54mm" 9.928,-22.479 r180 top
J10 "0533980367" 0533980367 -24.121,-35.456 r74 top
J11 "RC01835" RC01835 12.066,-10.212 r0 top locked
J12 "B6B-ZR-SM4-TF(LF)(SN)" B6B-ZR-SM4-TF(LF)(SN) 37.601,-48.336 r180 bottom
J13 "B6B-ZR-SM4-TF(LF)(SN)" B6B-ZR-SM4-TF(LF)(SN) 33.719,-28.082 r30 bottom
J14 "TYPE-C-31-D-06" TYPE-C-31-D-06 -3.124,-22.784 r270 bottom
J15 "SMC-1-05-1-GT" SMC-1-05-1-GT 26.695,-8.255 r136.5 top
LED1 "MHP5050RGBDT" MHP5050RGBDT -0.199,-6.122 r90 top locked
Q1 "MMBT2222A-7-F" SOT-23 35.017,-68.326 r0 top
Q2 "MMBT2222A-7-F" SOT-23 35.017,-63.647 r0 top
R1 "10K" Res-0402 -26.056,-35.892 r74 bottom
R2 "10K" Res-0402 -25.58,-34.24 r254 bottom
R3 "10K" Res-0402 -18.75,-24.248 r237 top locked
R4 "2.2K" Res-0603 -20.022,-26.153 r57 top locked value=2.2kR
R5 "6.34k" Res-0603 -16.361,-54.69 r270 top
R6 "1K" Res-0402 21.476,-63.846 r0 top
R7 "6.34k" Res-0603 -13.573,-32.806 r0 top
R8 "1K" Res-0402 29.813,-62.373 r0 top
R9 "6.34k" Res-0603 38.633,-54.704 r270 top
R10 "6.34k" Res-0603 19.694,-72.55 r0 top
R11 "6.34k" Res-0603 38.697,-32.277 r0 top
R12 "6.34k" Res-0603 12.267,-78.733 r0 top
R13 "150R" Res-0603 -3.785,-7.648 r90 top
R14 "47R" Res-0402 -0.647,-10.503 r270 top
R15 "47R" Res-0402 1.401,-10.503 r270 top
R16 "10K" Res-0402 25.296,-19.014 r180 bottom
R17 "5.1K" Res-0402 -6.374,-18.767 r0 bottom
R18 "5.1K" Res-0402 0.266,-24.004 r270 bottom
R19 "1M" Res-0603 -2.244,-14.884 r180 bottom
R20 "57.6R" Res-0402 32.533,-66.856 r270 top
R21 "57.6R" Res-0402 32.534,-64.647 r90 top
R22 "10K" Res-0402 7.85,-67.456 r90 top
R23 "4.7K" Res-0402 4.495,-67.838 r232 top
R24 "4.7K" Res-0402 3.326,-69.325 r52 top
R25 "1M" Res-0603 0.301,-8.222 r270 bottom
SW1 "TSC016A07018A" TSC016A07018A 23.326,-22.911 r270 bottom
SW3 "B3U-1000P" B3U-1000P -21.308,-24.143 r237 top locked
U1 "MCP9805-BE/ST" 8-TSSOP 12.241,-66.661 r180 top
U2 "STM32F407VET6" LQFP-100 -6.896,-66.167 r52 top
U3 "DRV8231ADSGR" WSON-8(2x2) -14.175,-54.21 r90 top
U4 "TLV9001IDCKR" SC-70-5 15.556,-79.383 r0 top
U5 "DRV8231ADSGR" WSON-8(2x2) -14.037,-30.657 r180 top
U6 "TLV9001IDCKR" SC-70-5 -19.156,-54.802 r180 top
U7 "DRV8231ADSGR" WSON-8(2x2) 40.819,-54.225 r90 top
U8 "DRV8231ADSGR" WSON-8(2x2) 19.215,-70.535 r180 top
U9 "DRV8231ADSGR" WSON-8(2x2) 38.217,-30.01 r180 top
U10 "DRV8231ADSGR" WSON-8(2x2) 11.787,-76.729 r180 top
U11 "TLV9001IDCKR" SC-70-5 -10.473,-33.329 r0 top
U12 "TLV9001IDCKR" SC-70-5 41.82,-32.927 r0 top
U13 "TLV9001IDCKR" SC-70-5 19.806,-75.115 r270 top
U14 "TLV9001IDCKR" SC-70-5 35.863,-54.816 r180 top
U15 "SN65HVDA1040AQDRQ1" "SOIC-8(0.154\", 3.90mm Width)" 27.583,-65.751 r0 top
U16 "SN74LV1T34DBVR" SOT-23-5 25.771,-71.712 r90 top
X1 "20MHz" SMD3225-4P -13.414,-75.053 r322 top
X2 "32.768kHz" SMD2012-2P -17.451,-72.495 r316 top

## Footprints (in the part's own frame and the unit in brackets; to place one, negate y for a bottom-side part, rotate by r counter-clockwise, add the part's x,y. Pads: shape width x height; smd on the part's side, far side on the other; paste and mask are expansions set on the pad)
8-TSSOP [mm] "IC SENSOR THERMAL 3.0V 8TSSOP"
  rect 1.45x0.45 smd: 1(-2.95,0.975) 2(-2.95,0.325) 3(-2.95,-0.325) 4(-2.95,-0.975) 5(2.95,-0.975) 6(2.95,-0.325) 7(2.95,0.325) 8(2.95,0.975)
  silkscreen extent -3.96,-1.55 2.24,1.55, body extent -3.2,-1.5 3.2,1.5, height 1.2
0533980367 [mm]
  rect 0.8x1.3 smd mask+0.076: 1(1.25,-1.375) 2(0,-1.375) 3(-1.25,-1.375)
  rect 2.1x3 smd mask+0.076: S1(-3.8,1.375) S2(3.8,1.375)
  silkscreen extent -4.45,-2.43 4.45,2.48, body extent -4.45,-1.86 4.45,3.74, height 5.77
B3U-1000P [mm] "SWITCH TACTILE SPST-NO 0.05A 12V"
  rect 0.82x1.72 smd: 1(-1.7,0) 2(1.7,0)
  silkscreen extent -1.57,-1.3 1.57,1.3, body extent -2,-1.26 2,1.24, height 1.6
B6B-ZR-SM4-TF(LF)(SN) [mm]
  rect 0.7x4 smd paste+0 mask+0.051: 1(-3.75,-1.275) 2(-2.25,-1.275) 3(-0.75,-1.275) 4(0.75,-1.275) 5(2.25,-1.275) 6(3.75,-1.275)
  rect 1.5x2.3 smd paste+0 mask+0.051: MP1(-5.8,1.275) MP2(5.8,1.275)
  silkscreen extent -6,-1.85 6,2.72, body extent -6,-2.49 6,2.71, height 5
Cap-0201 [mm]
  rect 0.3x0.3 smd mask+0.055: 1(-0.3,0) 2(0.3,0)
  silkscreen extent -0.53,-0.23 0.53,0.23, body extent -0.3,-0.15 0.3,0.15, height 0.28
Cap-0402 [mil]
  rect 18x25 smd mask+2.36: 1(-18.5,0) 2(18.5,0)
  silkscreen extent -31,-16 31,16, body extent -20,-10 20,10, height 19
Cap-0603 [mil]
  rect 30x35 smd mask+2.36: 1(-30,0) 2(30,0)
  silkscreen extent -49,-21 49,21, body extent -32,-16 31,16, height 34
Cap-1206 [mil] "SMD 1206"
  rect 60x70 smd: 1(-50,0) 2(50,0)
  silkscreen extent -84,-39 84,39, body extent -63,-31 63,32, height 39
DFN-2(0.3x0.6) [mm]
  rect 0.27x0.26 smd mask+0.05: 1(-0.195,0) 2(0.195,0)
  silkscreen extent -0.41,-0.2 0.41,0.2, body extent -0.3,-0.15 0.3,0.15, height 0.3
DSN0603-2 [mm]
  rect 0.2x0.24 smd mask+0.055: 1(-0.2,0) 2(0.2,0)
  silkscreen extent -0.38,-0.2 0.38,0.2, body extent -0.3,-0.15 0.3,0.15, height 0.32
"HDR 2x3 Male SMD 2.54mm" [mm]
  rect 3.1x1.02 smd paste+0 mask+0.05: 1(-2.69,2.54) 2(2.69,2.54) 3(-2.69,0) 4(2.69,0) 5(-2.69,-2.54) 6(2.69,-2.54)
  silkscreen extent -4.57,-3.8 2.5,3.8, body extent -3.75,-3.82 3.75,3.82, height 9.2
Ind-0805 [mm] "Inductor 0805"
  rect 1.2x1.32 smd: 1(-1,0) 2(1,0)
  silkscreen extent -0.25,-0.69 0.25,0.69, body extent -1,-0.62 1,0.63, height 0.47
LQFP-100 [mm]
  rect 1.2x0.3 smd: 1(-7.75,6) 2(-7.75,5.5) 3(-7.75,5) 4(-7.75,4.5) 5(-7.75,4) 6(-7.75,3.5) 7(-7.75,3) 8(-7.75,2.5) 9(-7.75,2) 10(-7.75,1.5) 11(-7.75,1) 12(-7.75,0.5) 13(-7.75,0) 14(-7.75,-0.5) 15(-7.75,-1) 16(-7.75,-1.5) 17(-7.75,-2) 18(-7.75,-2.5) 19(-7.75,-3) 20(-7.75,-3.5) 21(-7.75,-4) 22(-7.75,-4.5) 23(-7.75,-5) 24(-7.75,-5.5) 25(-7.75,-6) 51(7.75,-6) 52(7.75,-5.5) 53(7.75,-5) 54(7.75,-4.5) 55(7.75,-4) 56(7.75,-3.5) 57(7.75,-3) 58(7.75,-2.5) 59(7.75,-2) 60(7.75,-1.5) 61(7.75,-1) 62(7.75,-0.5) 63(7.75,0) 64(7.75,0.5) 65(7.75,1) 66(7.75,1.5) 67(7.75,2) 68(7.75,2.5) 69(7.75,3) 70(7.75,3.5) 71(7.75,4) 72(7.75,4.5) 73(7.75,5) 74(7.75,5.5) 75(7.75,6)
  rect 0.3x1.2 smd: 26(-6,-7.75) 27(-5.5,-7.75) 28(-5,-7.75) 29(-4.5,-7.75) 30(-4,-7.75) 31(-3.5,-7.75) 32(-3,-7.75) 33(-2.5,-7.75) 34(-2,-7.75) 35(-1.5,-7.75) 36(-1,-7.75) 37(-0.5,-7.75) 38(0,-7.75) 39(0.5,-7.75) 40(1,-7.75) 41(1.5,-7.75) 42(2,-7.75) 43(2.5,-7.75) 44(3,-7.75) 45(3.5,-7.75) 46(4,-7.75) 47(4.5,-7.75) 48(5,-7.75) 49(5.5,-7.75) 50(6,-7.75) 76(6,7.75) 77(5.5,7.75) 78(5,7.75) 79(4.5,7.75) 80(4,7.75) 81(3.5,7.75) 82(3,7.75) 83(2.5,7.75) 84(2,7.75) 85(1.5,7.75) 86(1,7.75) 87(0.5,7.75) 88(0,7.75) 89(-0.5,7.75) 90(-1,7.75) 91(-1.5,7.75) 92(-2,7.75) 93(-2.5,7.75) 94(-3,7.75) 95(-3.5,7.75) 96(-4,7.75) 97(-4.5,7.75) 98(-5,7.75) 99(-5.5,7.75) 100(-6,7.75)
  silkscreen extent -8.64,-7.27 7.24,7.24, body extent -8,-8 8,8, height 1.6
MHP5050RGBDT [mm]
  rect 1.625x0.896 smd paste+0 mask+0.051: 1(2.288,1.6) 2(-2.288,1.6) 3(2.288,0) 4(-2.288,0) 5(2.288,-1.6) 6(-2.288,-1.6)
  silkscreen extent -2.58,-2.58 3.43,2.58, body extent -2.65,-2.5 2.65,2.5, height 1.64
MicroSMP [mm]
  rect 2x1.1 smd paste+0 mask+0.051: 1(-0.95,0)
  rect 0.8x0.8 smd paste+0 mask+0.051: 2(0.95,0)
  silkscreen extent -1.09,-0.76 1.75,0.76, body extent -1.25,-0.65 1.25,0.65, height 0.66
RC01835 [mm]
  round 1.3 hole 0.9 paste-2539.97 mask+0.05: 1(-3.57,-2.7) 2(-2.55,-3.8) 3(-1.53,-2.7) 4(-0.51,-3.8) 5(0.51,-2.7) 6(1.53,-3.8) 7(2.55,-2.7) 8(3.57,-3.8) 9(-7.06,-1.6) 10(-4.77,-1.6) 11(4.77,-1.6) 12(7.06,-1.6)
  oval 1.5x3 hole 1 slot 2.4 at 90 deg paste-2539.97 mask+0.05: 13(-8,3.8) 14(8,3.8)
  silkscreen extent -8.13,-4.04 8.13,11.81, body extent -8.1,-4.01 8.1,11.71, height 7.12
Res-0402 [mil]
  rect 18x25 smd mask+2.17: 1(-18.5,0) 2(18.5,0)
  silkscreen extent -32,-17 32,16, body extent -23,-11 23,11, height 16
Res-0603 [mil]
  rect 30x35 smd: 1(-30,0) 2(30,0)
  silkscreen extent -48,-21 48,21, body extent -31,-17 31,17, height 18
SC-70-5 [mm]
  rect 0.73x0.38 smd: 1(-0.95,0.65) 2(-0.95,0) 3(-0.95,-0.65) 4(0.95,-0.65) 5(0.95,0.65)
  silkscreen extent -1.57,-1.04 0.46,1.04, body extent -1.05,-1 1.05,1, height 0.95
SMB_ [mm]
  rect 2.8x2.4 smd: 1(-2.3,0) 2(2.3,0)
  silkscreen extent -2.21,-1.91 4.83,1.9, body extent -2.7,-1.8 2.7,1.8, height 2.3
SMC-1-05-1-GT [mm]
  rect 1.8x1.8 hole 0.9: 1(-5.08,0)
  round 1.8 hole 0.9: 2(-2.54,0) 3(0,0) 4(2.54,0) 5(5.08,0)
  silkscreen extent -6.35,-1.27 6.35,1.3, body extent -6.32,-1.28 6.38,1.26, height 7
SMD2012-2P [mm]
  rect 0.7x1.4 smd: 1(-0.75,0) 2(0.75,0)
  silkscreen extent -0.18,-0.61 0.18,0.61, body extent -1.02,-0.62 1.03,0.58, height 0.6
SMD3225-4P [mm]
  rect 1.4x1.2 smd: 1(-1.1,-0.85) 2(1.1,-0.85) 3(1.1,0.85) 4(-1.1,0.85)
  silkscreen extent -2.08,-1.3 1.65,1.3, body extent -1.6,-1.25 1.6,1.25, height 0.81
SOD-123 [mm]
  rect 0.95x0.9 smd: 1(-1.575,0) 2(1.575,0)
  silkscreen extent -1.37,-0.8 2.82,0.8, body extent -1.82,-0.77 1.83,0.78, height 1.5
"SOIC-8(0.154\", 3.90mm Width)" [mm]
  rect 1.55x0.6 smd: 1(-2.7,1.905) 2(-2.7,0.635) 3(-2.7,-0.635) 4(-2.7,-1.905) 5(2.7,-1.905) 6(2.7,-0.635) 7(2.7,0.635) 8(2.7,1.905)
  silkscreen extent -3.79,-2.51 1.8,2.51, body extent -3.01,-2.45 3.01,2.45, height 1.63
Sot-23 [mm] "TRANS NPN 40V 0.6A SOT23"
  rect 0.82x0.92 smd: 1(-0.95,-1) 2(0.95,-1) 3(0,1)
  silkscreen extent -1.68,-1.3 1.55,0.81, body extent -1.5,-1.25 1.5,1.25, height 1.05
SOT-23 [mm] "TRANS NPN 40V 0.6A SOT23"
  rect 0.82x0.92 smd: 1(-0.95,-1) 2(0.95,-1) 3(0,1)
  silkscreen extent -1.68,-1.3 1.55,0.81, body extent -1.5,-1.25 1.5,1.25, height 1.05
SOT-23-5 [mm]
  rect 1.1x0.6 smd: 1(-1.3,0.95) 2(-1.3,0) 3(-1.3,-0.95) 4(1.3,-0.95) 5(1.3,0.95)
  silkscreen extent -2.13,-1.5 0.88,1.5, body extent -1.4,-1.45 1.4,1.45, height 1.45
TSC016A07018A [mm]
  round 1.6 hole 1 paste-2539.97 mask+0.051: 1(-2.4,1.5) 2(2.4,1.5) 3(-2.4,-1.5) 4(2.4,-1.5)
  silkscreen extent -2.25,-2.25 2.4,2.25, body extent -3.2,-2.25 3.2,2.25, height 3.9
TYPE-C-31-D-06 [mm]
  rect 0.3x0.87 smd: A1(-2.75,0.865) A4(-1.25,0.865) A5(-0.75,0.865) A6(-0.25,0.865) A7(0.25,0.865) A8(0.75,0.865) A9(1.25,0.865) A12(2.75,0.865) B1(2.75,-0.865) B4(1.25,-0.865) B5(0.75,-0.865) B6(0.25,-0.865) B7(-0.25,-0.865) B8(-0.75,-0.865) B9(-1.25,-0.865) B12(-2.75,-0.865)
  round 0 hole 0.52 unplated: MH(-3.75,0)
  round 0 hole 0.6 slot 0.72 at 0 deg unplated: MH(3.75,0)
  oval 1.35x1.1 hole 0.6 slot 0.85 at 0 deg: S1(-2.4,2.15) S2(2.4,2.15) S3(2.4,-2.15) S4(-2.4,-2.15)
  silkscreen extent -4.39,-1.7 4.39,1.7, body extent -4.49,-2.28 4.45,2.32, height 6.55
WSON-8(2x2) [mm]
  rect 0.5x0.25 smd paste+0 mask+0.051: 1(-0.949,0.751) 2(-0.951,0.252) 3(-0.95,-0.251) 4(-0.951,-0.751) 5(0.951,-0.751) 6(0.951,-0.249) 7(0.951,0.251) 8(0.951,0.75)
  round 0.6 / inner round 0.6 / far side round 0 hole 0.3: 9(0,0.55) 9(0,-0.55)
  rect 0.9x1.8 smd paste+0 mask+0.051: 9(0,0)
  silkscreen extent -1.46,-1.05 1,1.05, body extent -1,-1 1,1, height 0.77

## Part data
C1 C2 C10 C11 C12 C14 C15 C16 C19 C23 C24 C25 C26 C27 C28 C29 C30 C31 C32 C34 C36 C38 C41 C42 C43 C44 C45 C47 C50: library part GRM155R62A104KE14D, "CAP CER 0.1UF 100V X5R 0402", Capacitance=100nF, Case Code (Imperial)=0402, Case Code (Metric)=1005, Dielectric=X5R, LCSC Part Number=C162178, Manufacturer=Murata, Max Operating Temperature=85°C, Min Operating Temperature=-55°C, Package Quantity=10000, Tolerance=10%, Voltage Rating=100V, Case/Package=0402, Category="Ceramic Capacitors", ComponentLink1Description=http://www.farnell.com/datasheets/2079151.pdf?src-supplier=Farnell, ComponentLink1URL=http://www.farnell.com/datasheets/2079151.pdf?src-supplier=Farnell, ComponentLink2Description=http://www.mouser.com/ds/2/281/c02e-2905.pdf?src-supplier=Mouser, ComponentLink2URL=http://www.mouser.com/ds/2/281/c02e-2905.pdf?src-supplier=Mouser, ComponentLink3Description=http://www.farnell.com/datasheets/2079151.pdf?src-supplier=Element14, ComponentLink3URL=http://www.farnell.com/datasheets/2079151.pdf?src-supplier=Element14, ComponentLink4Description=http://search.murata.co.jp/Ceramy/image/img/A01X/G101/ENG/GRM155R62A104KE14-01.pdf?src-supplier=Digi-Key, ComponentLink4URL=http://search.murata.co.jp/Ceramy/image/img/A01X/G101/ENG/GRM155R62A104KE14-01.pdf?src-supplier=Digi-Key, ComponentLink5Description=http://www.farnell.com/datasheets/2079151.pdf?src-supplier=Newark, ComponentLink5URL=http://www.farnell.com/datasheets/2079151.pdf?src-supplier=Newark, Height=0.5mm, Item Type=Capacitor, Lead Free="Lead Free", Length=0.039inch, Manufacturer Part Number=GRM155R62A104KE14D, Mount="Surface Mount", Packaging="Tape and Reel", Pricing 1="10000=0.00500, 20000=0.00410, 30000=0.00390, 50000=0.00370, 100000=0.00300 (USD)", Reach SVHC Compliant=Yes, RoHS=Yes, RoHS Compliant=Yes, Series=GRM, Stock 1=870000, Supplier 1="Arrow Electronics", Supplier Part Number 1=GRM155R62A104KE14D, Termination=SMD/SMT, Thickness=0.022inch, Voltage Rating (DC)=100V, Weight=0.000212oz, Width=0.02inch
C3 C4: library part CC0201JRNPO9BN330, "CAP CER 33PF 50V C0G/NPO 0201", LCSC Part Number=C277477, Manufacturer=Yageo, Supplier Part Number=7106789, Category="Ceramic Capacitors", ComponentLink1Description=https://datasheet.ciiva.com/13211/upy-gp-np0-16v-to-50v-8-13211019.pdf?src-supplier=Mouser, ComponentLink1URL=https://datasheet.ciiva.com/13211/upy-gp-np0-16v-to-50v-8-13211019.pdf?src-supplier=Mouser, Item Type=Capacitor, Manufacturer Part Number=CC0201JRNPO9BN330, Pricing="15000=0.0012, 60000=0.0011, 225000=0.0011, 600000=0.001, 1500000=0.001 (USD)", RoHS=Yes, Stock=2085000, Supplier="Future Electronics"
C5 C6: library part C1005X5R0J225KTJA0E, "CAP CER 2.2UF 6.3V X5R 0402", LCSC Part Number=C343036, Manufacturer=TDK, ComponentLink1Description=LCSC, ComponentLink1URL=https://www.lcsc.com/product-detail/Multilayer-Ceramic-Capacitors-MLCC-SMD-SMT_TDK-C1005X5R0J225KTJA0E_C343036.html, Item Type=Capacitor, Manufacturer Part Number=C1005X5R0J225KTJA0E
C7 C8: library part CC0201JRNPO9BN150, "CAP CER 15PF 50V C0G/NPO 0201", LCSC Part Number=C277480, Manufacturer=Yageo, Supplier Part Number=2580314, Category="Ceramic Capacitors", ComponentLink1Description=https://datasheet.ciiva.com/176/mlccorderingcode-176501.pdf?src-supplier=Digi-Key, ComponentLink1URL=https://datasheet.ciiva.com/176/mlccorderingcode-176501.pdf?src-supplier=Digi-Key, ComponentLink2Description=https://datasheet.ciiva.com/176/mlccorderingcode-176502.pdf?src-supplier=Digi-Key, ComponentLink2URL=https://datasheet.ciiva.com/176/mlccorderingcode-176502.pdf?src-supplier=Digi-Key, ComponentLink3Description=https://datasheet.ciiva.com/176/mlccorderingcode-176503.pdf?src-supplier=Digi-Key, ComponentLink3URL=https://datasheet.ciiva.com/176/mlccorderingcode-176503.pdf?src-supplier=Digi-Key, ComponentLink4Description=https://datasheet.ciiva.com/17205/upy-gp-np0-16v-to-50v-8-17205625.pdf?src-supplier=Future+Electronics, ComponentLink4URL=https://datasheet.ciiva.com/17205/upy-gp-np0-16v-to-50v-8-17205625.pdf?src-supplier=Future+Electronics, Item Type=Capacitor, Manufacturer Part Number=CC0201JRNPO9BN150, Pricing="15000=0.0012, 60000=0.0011, 225000=0.0011, 600000=0.001, 1500000=0.001 (USD)", RoHS=Yes, Stock=585000, Supplier="Future Electronics"
C9 C13 C17 C18 C21 C22: library part GRM188R61E106KA73D, "CAP CER 10UF 25V X5R 0603", Case/Package=0603, LCSC Part Number=C344022, Manufacturer=Murata, Supplier Part Number 1=81-GRM188R61E106KA3D, Category="Ceramic Capacitors", ComponentLink1Description=https://search.murata.co.jp/Ceramy/image/img/A01X/G101/ENG/GRM188R61E106KA73-01.pdf?src-supplier=Digi-Key, ComponentLink1URL=https://search.murata.co.jp/Ceramy/image/img/A01X/G101/ENG/GRM188R61E106KA73-01.pdf?src-supplier=Digi-Key, Manufacturer Part Number=GRM188R61E106KA73D, Pricing 1="1=0.36000, 10=0.25800, 50=0.25800, 100=0.15500, 1000=0.09800, 10000=0.06900 (USD)", RoHS=Yes, RoHS Compliant=Yes, Stock 1=319428, Supplier 1=Mouser
C20 C33: library part CC1206KKX7RCBB472, "CAP CER 4700PF 1KV X7R 1206", Case Code (Imperial)=1206, Case Code (Metric)=3216, Dielectric=X7R, Dielectric Material=Ceramic, LCSC Part Number=C107198, Manufacturer=Yageo, Max Operating Temperature=125°C, Min Operating Temperature=-55°C, Supplier Part Number 1=7130131, Tolerance=10%, Voltage Rating=1kV, Capacitance=4.7nF, Case/Package=1206, Category="Ceramic Capacitors", ComponentLink1Description=https://datasheet.ciiva.com/13208/upy-gp-np0-16v-to-50v-8-13208693.pdf?src-supplier=Mouser, ComponentLink1URL=https://datasheet.ciiva.com/13208/upy-gp-np0-16v-to-50v-8-13208693.pdf?src-supplier=Mouser, ComponentLink2Description=https://datasheet.ciiva.com/11466/hv-11466701.pdf?src-supplier=Avnet, ComponentLink2URL=https://datasheet.ciiva.com/11466/hv-11466701.pdf?src-supplier=Avnet, Depth=1.6mm, Item Type=Capacitor, Lead Free="Lead Free", Length=3.2mm, Manufacturer Part Number=CC1206KKX7RCBB472, Mount="Surface Mount", Number of Pins=2, Packaging="Tape and Reel", Pricing 1="3000=0.02860, 9000=0.02750, 15000=0.02700, 45000=0.02600, 75000=0.02510 (USD)", Radiation Hardening=No, Resistor Type=Ceramic, RoHS=Yes, RoHS Compliant=Yes, Series=CC, Stock 1=180000, Supplier 1="Future Electronics", Termination=SMD/SMT, Thickness=0.057inch, Voltage Rating (DC)=1kV, Weight=0.000571oz, Width=0.063inch
C35 C37 C39 C40: library part CL05A106MP5NUNC, "CAP CER 10UF 10V X5R 0402", Case Code (Imperial)=0402, Case Code (Metric)=1005, Dielectric=X5R, LCSC Part Number=C315248, Manufacturer=Samsung, Max Operating Temperature=85°C, Min Operating Temperature=-55°C, Package Quantity=1, Tolerance=20%, Voltage Rating=10V, Capacitance=10uF, Case/Package=0402, Category="Ceramic Capacitors", ComponentLink1Description=https://datasheet.ciiva.com/25721/cl05a106mp5nunc-25721584.pdf?src-supplier=Digi-Key, ComponentLink1URL=https://datasheet.ciiva.com/25721/cl05a106mp5nunc-25721584.pdf?src-supplier=Digi-Key, ComponentLink2Description=https://datasheet.ciiva.com/26838/getdatasheetpartid-745310-26838170.pdf?src-supplier=Verical, ComponentLink2URL=https://datasheet.ciiva.com/26838/getdatasheetpartid-745310-26838170.pdf?src-supplier=Verical, Construction=Flat, Contact Plating=Tin, Depth=0.5mm, Item Type=Capacitor, Lead Free="Lead Free", Length=1mm, Manufacturer Part Number=CL05A106MP5NUNC, Mount="Surface Mount", Packaging="Tape and Reel", Pricing 1="10000=0.02537 (USD)", Radiation Hardening=No, RoHS=Yes, RoHS Compliant=Yes, Series=CL, Stock 1=1729850, Supplier 1=Avnet, Supplier Part Number 1=CL05A106MP5NUNC, Termination=Wraparound, Thickness=0.028inch, Width=0.02inch
C49: library part CC0603KRX5R8BB105, "CAP CER 1UF 25V X5R 0603", Case Code (Imperial)=0603, Case Code (Metric)=1608, Dielectric=X5R, LCSC Part Number=C14664, Manufacturer=Yageo, Max Operating Temperature=85°C, Min Operating Temperature=-55°C, Package Quantity=1, Supplier Part Number 1=311-1445-1-ND, Tolerance=10%, Voltage Rating=25V, Capacitance=1uF, Case/Package=0603, Category="Ceramic Capacitors", ComponentLink1Description=https://datasheet.ciiva.com/176/mlccorderingcode-176785.pdf?src-supplier=Digi-Key, ComponentLink1URL=https://datasheet.ciiva.com/176/mlccorderingcode-176785.pdf?src-supplier=Digi-Key, ComponentLink2Description=https://datasheet.ciiva.com/176/mlccorderingcode-176786.pdf?src-supplier=Digi-Key, ComponentLink2URL=https://datasheet.ciiva.com/176/mlccorderingcode-176786.pdf?src-supplier=Digi-Key, ComponentLink3Description=https://datasheet.ciiva.com/176/mlccorderingcode-176787.pdf?src-supplier=Digi-Key, ComponentLink3URL=https://datasheet.ciiva.com/176/mlccorderingcode-176787.pdf?src-supplier=Digi-Key, ComponentLink4Description=https://datasheet.ciiva.com/17436/upy-gphc-x5r-4v-to-50v-12-17436952.pdf?src-supplier=Avnet+Europe, ComponentLink4URL=https://datasheet.ciiva.com/17436/upy-gphc-x5r-4v-to-50v-12-17436952.pdf?src-supplier=Avnet+Europe, ComponentLink5Description=https://datasheet.ciiva.com/7978/1525783-7978171.pdf?src-supplier=Element14, ComponentLink5URL=https://datasheet.ciiva.com/7978/1525783-7978171.pdf?src-supplier=Element14, ComponentLink6Description=https://datasheet.ciiva.com/11586/upy-gphc-x5r-4v-to-50v-12-11586318.pdf?src-supplier=Avnet, ComponentLink6URL=https://datasheet.ciiva.com/11586/upy-gphc-x5r-4v-to-50v-12-11586318.pdf?src-supplier=Avnet, Construction=Flat, Depth=0.8mm, Halogen Free="Halogen Free", Height=0.8mm, Item Type=Capacitor, Lead Free="Lead Free", Length=1.6mm, Manufacturer Part Number=CC0603KRX5R8BB105, Mount="Surface Mount", Number of Pins=2, Packaging="Tape and Reel", Pricing 1="1=0.12000, 10=0.08400, 50=0.04760, 100=0.03940, 500=0.02764, 1000=0.02288 (USD)", Radiation Hardening=No, REACH SVHC="No SVHC", RoHS=Yes, RoHS Compliant=Yes, Series=CC, Stock 1=919939, Supplier 1=Digi-Key, Termination=SMD/SMT, Thickness=0.035inch, Voltage Rating (DC)=25V, Width=0.031inch
D1: "16A 20V 7V 5V@Max Unidirectional SOT-23 TVS ROHS", LCSC Part Number=C239643, Manufacturer=WILLSEMI, Package=SOT-23, ComponentLink1Description=LCSC, ComponentLink1URL=https://www.lcsc.com/product-detail/TVS_WILLSEMI-Will-Semicon-ESD5302F-3-TR_C239643.html, Item Type=Diode, Manufacturer Part Number=ESD5302F-3/TR
D2: "TVS DIODE 24VWM 40VC SOT23-3", LCSC Part Number=C350941, Manufacturer=Bourns, ComponentLink1Description=http://www.farnell.com/datasheets/2372435.pdf?src-supplier=Farnell, ComponentLink1URL=http://www.farnell.com/datasheets/2372435.pdf?src-supplier=Farnell, ComponentLink2Description=https://www.bourns.com/docs/Product-Datasheets/cdsot23-t24can-Q.pdf?src-supplier=Digikey, ComponentLink2URL=https://www.bourns.com/docs/Product-Datasheets/cdsot23-t24can-Q.pdf?src-supplier=Digikey, ComponentLink3Description=http://www.farnell.com/datasheets/2372435.pdf?src-supplier=Newark, ComponentLink3URL=http://www.farnell.com/datasheets/2372435.pdf?src-supplier=Newark, Item Type="TVS Diodes", Manufacturer Part Number=CDSOT23-T24CAN-Q, Pricing="1=0.36, 10=0.282, 100=0.1691, 500=0.15656, 1000=0.10645, 3000=0.098, 6000=0.09393, 9000=0.08454, 30000=0.08328, 75000=0.07827 (USD)", RoHS=Yes, RoHS Compliant=5897YesNo, Stock=17231, Supplier=Digikey
D3: "TVS SURGE PROTECTOR 1-CH 3.3V", LCSC Part Number=-, Manufacturer=Amazing, Package=SOD-123, ComponentLink1Description=Digikey, ComponentLink1URL=https://www.digikey.com/en/products/detail/amazing/AZ3003-01G/16615352?s=N4IgTCBcDaIIIC0DMAGFSC0KCMBxEAugL5A, Item Type=Diode, Manufacturer Part Number=AZ3003-01G
D4 D5 D6 D7 D8 D9 D10 D11 D12 D13 D14 D18 D19 D20 D21 D22 D23 D24 D25 D26 D27 D28 D29 D30 D31 D32 D33 D35 D37 D38 D39 D40 D41 D42: "TVS DIODE 3.3VWM 3.7VC DSN0603-2", LCSC Part Number=C552535, Manufacturer=Nexperia, Supplier Part Number=9101291, ComponentLink1Description=http://www.farnell.com/datasheets/2621606.pdf?src-supplier=Farnell, ComponentLink1URL=http://www.farnell.com/datasheets/2621606.pdf?src-supplier=Farnell, ComponentLink2Description=http://www.farnell.com/datasheets/2621606.pdf?src-supplier=Newark, ComponentLink2URL=http://www.farnell.com/datasheets/2621606.pdf?src-supplier=Newark, Item Type="TVS Diodes", Manufacturer Part Number=PESD3V3Y1BSFYL, Pricing="9000=0.0488, 18000=0.0477, 36000=0.0466, 45000=0.0463, 135000=0.0442 (USD)", RoHS=No, Stock=9000, Supplier="Future Electronics"
D15: "58.1A 600W 10.5V@58.1A 6.45V Unidirectional 5.8V SMB Electrostatic and Surge Protection (TVS/ESD) ROHS", LCSC Part Number=C5439947, Manufacturer=BORN, Package=SMB, ComponentLink1Description=LCSC, ComponentLink1URL=https://www.lcsc.com/product-detail/Electrostatic-and-Surge-Protection-TVS-ESD_BORN-P6SMB6-8A_C5439947.html, Item Type=TVS/ESD, Manufacturer Part Number=P6SMB6.8A
D16: "TVS DIODE 12VWM 19.9VC MICROSMP", LCSC Part Number=C1973858, Max Operating Temperature=150°C, Min Breakdown Voltage=13.3V, Min Operating Temperature=-55°C, Peak Pulse Current=7.5A, Peak Pulse Power=150W, Power Line Protection=No, Reverse Standoff Voltage=12V, Supplier Part Number=78-MSMP12A-M389A, Category="TVS Diodes", ComponentLink1Description=LCSC, ComponentLink2Description=http://www.vishay.com/docs/89457/mspm6a.pdf?src-supplier=Digi-Key, ComponentLink2URL=http://www.vishay.com/docs/89457/mspm6a.pdf?src-supplier=Digi-Key, ComponentLink3Description=http://www.vishay.com/docs/89457/msmp6athrumsmp20a.pdf?src-supplier=Digi-Key, ComponentLink3URL=http://www.vishay.com/docs/89457/msmp6athrumsmp20a.pdf?src-supplier=Digi-Key, Diode Type=ZENER, Item Type="TVS Diode", Mounting Technology="Surface Mount", Number of Unidirectional Channels=1, Packaging="Tape and Reel", Pricing="1=0.36, 10=0.294, 50=0.294, 100=0.118, 1000=0.069, 10000=0.048 (USD)", RoHS=Yes, RoHS Compliant=Yes, Series=TransZorb®, Stock=17037, Supplier=Mouser
D17: "DIODE BIDIR ESD X4DFN2", LCSC Part Number=C896720, Manufacturer="ON Semiconductor", Item Type=(TVS/ESD), Manufacturer Part Number=ESDM2033MX4T5G, Pricing="8961=0.04129, 9000=0.04018, 18000=0.03906, 45000=0.03794, 90000=0.03683, 450000=0.03571, 900000=0.0346 (USD)", RoHS=Yes, Series=-, Stock=629400, Supplier=Avnet
D34 D36: "TVS DIODE 5VWM 6.3VC DSN0603-2", LCSC Part Number=C477989, Manufacturer=Nexperia, Category="ESD and Circuit Protection ICs", ComponentLink1Description=http://www.farnell.com/datasheets/1961312.pdf?src-supplier=Farnell, ComponentLink1URL=http://www.farnell.com/datasheets/1961312.pdf?src-supplier=Farnell, ComponentLink2Description=https://assets.nexperia.com/documents/data-sheet/PESD5V0H1BSF.pdf?src-supplier=Digi-Key, ComponentLink2URL=https://assets.nexperia.com/documents/data-sheet/PESD5V0H1BSF.pdf?src-supplier=Digi-Key, ComponentLink3Description=http://www.farnell.com/datasheets/1961312.pdf?src-supplier=Newark, ComponentLink3URL=http://www.farnell.com/datasheets/1961312.pdf?src-supplier=Newark, Item Type=Diode, Manufacturer Part Number=PESD5V0H1BSFYL, Pricing 1="18000=0.06453, 36000=0.06278, 54000=0.06104, 90000=0.05930, 180000=0.05755, 900000=0.05581, 1800000=0.05406 (USD)", RoHS=Yes, RoHS Compliant=Yes, Stock 1=9000, Supplier 1=Avnet, Supplier Part Number 1=PESD5V0H1BSFYL
FB1 FB2: "FERRITE BEAD 22 OHM 0805 1LN", LCSC Part Number=C88993, Manufacturer=Murata, Supplier Part Number=7241539P, Category="Ferrite Beads and Chips", ComponentLink1Description=https://datasheet.ciiva.com/14122/anblm21p-data-e-14122211.pdf?src-supplier=Distrelec, ComponentLink1URL=https://datasheet.ciiva.com/14122/anblm21p-data-e-14122211.pdf?src-supplier=Distrelec, ComponentLink2Description=https://datasheet.ciiva.com/11799/0900766b81275e31-11799177.pdf?src-supplier=Rs, ComponentLink2URL=https://datasheet.ciiva.com/11799/0900766b81275e31-11799177.pdf?src-supplier=Rs, ComponentLink3Description=https://datasheet.ciiva.com/29700/1845312-29700540.pdf?src-supplier=Jameco, ComponentLink3URL=https://datasheet.ciiva.com/29700/1845312-29700540.pdf?src-supplier=Jameco, ComponentLink4Description=https://datasheet.ciiva.com/16291/l0110s0100blm21p-16291622.pdf?src-supplier=Future+Electronics, ComponentLink4URL=https://datasheet.ciiva.com/16291/l0110s0100blm21p-16291622.pdf?src-supplier=Future+Electronics, ComponentLink5Description=https://datasheet.ciiva.com/8021/5160-8021589.pdf?src-supplier=Element14, ComponentLink5URL=https://datasheet.ciiva.com/8021/5160-8021589.pdf?src-supplier=Element14, ComponentLink6Description=https://datasheet.ciiva.com/8021/5160-8021591.pdf?src-supplier=Element14, ComponentLink6URL=https://datasheet.ciiva.com/8021/5160-8021591.pdf?src-supplier=Element14, ComponentLink7Description=https://datasheet.ciiva.com/6211/l0110s0100blm21p-6211741.pdf?src-supplier=Digi-Key, ComponentLink7URL=https://datasheet.ciiva.com/6211/l0110s0100blm21p-6211741.pdf?src-supplier=Digi-Key, ComponentLink8Description=https://datasheet.ciiva.com/3081/l0110s0100blm21p-3081653.pdf?src-supplier=Avnet, ComponentLink8URL=https://datasheet.ciiva.com/3081/l0110s0100blm21p-3081653.pdf?src-supplier=Avnet, ComponentLink9Description=https://datasheet.ciiva.com/41449/001171738-da-01-en-chip-drossel0805-22r0-6000ma-2-0x1-25mm-41449366.pdf?src-supplier=Conrad, ComponentLink9URL=https://datasheet.ciiva.com/41449/001171738-da-01-en-chip-drossel0805-22r0-6000ma-2-0x1-25mm-41449366.pdf?src-supplier=Conrad, Item Type="Ferrite Bead", Manufacturer Part Number=BLM21PG220SN1D, Pricing="500=0.043, 1000=0.038, 2500=0.033, 5000=0.03 (GBP)", RoHS=Yes, Stock=10325, Supplier=Rs
J1 J2 J3 J4 J5 J6 J7 J8 J12 J13: "CONN HEADER SMD 6POS 1.5MM", LCSC Part Number=C471473, Manufacturer=JST, Package=SMD,P=1.5mm, ComponentLink1Description="LCSC Link", ComponentLink1URL=https://www.lcsc.com/product-detail/Wire-To-Board-Connector_JST-B6B-ZR-SM4-TF-LF-SN_C471473.html, Item Type=Connector, Manufacturer Part Number=B6B-ZR-SM4-TF(LF)(SN)
J9: "250V 3A Standing paste Policy 2.5mm 6mm 6P -40℃~+105℃ 2.54mm Double Row Black 2.54mm 2x3P SMD,P=2.54mm Pin Headers ROHS", LCSC Part Number=C3294461, Manufacturer=HCTL, Package=SMD,P=2.54mm, ComponentLink1Description=LCSC, ComponentLink1URL=https://www.lcsc.com/product-detail/Pin-Headers_HCTL-PZ254-2-03-S_C3294461.html, Item Type=Header, Manufacturer Part Number=PZ254-2-03-S
J10: "CONN HEADER SMD 3POS 1.25MM", LCSC Part Number=C17555262, Manufacturer=Molex, Supplier Part Number=538-53398-0367, ComponentLink1Description=https://datasheet.ciiva.com/2944/533980367-sd-2944045.pdf?src-supplier=Digikey, ComponentLink1URL=https://datasheet.ciiva.com/2944/533980367-sd-2944045.pdf?src-supplier=Digikey, Item Type="Wire To Board Connector", Manufacturer Part Number=0533980367, Pricing="1=1.41, 10=1.17, 50=1.17, 100=0.963, 1000=0.77, 10000=0.634 (USD)", RoHS=Yes, Stock=5361, Supplier=Mouser
J11: "RJ45 RJReceptacle 1 有屏蔽 Sink board WithLED -40℃~+70℃ Plugin Ethernet Connectors/Modular Connectors (RJ45 RJ11) ROHS", LCSC Part Number=C708648, Manufacturer=RCH, Package=Plugin, ComponentLink1Description=LCSC, ComponentLink1URL=https://www.lcsc.com/product-detail/Ethernet-Connectors-Modular-Connectors-RJ45-RJ11_RCH-RC01835_C708648.html, Item Type=Ethernet, Manufacturer Part Number=RC01835
J14: "1 Brick nogging 16 Female -25℃~+85℃ Type-C SMD USB Connectors ROHS", LCSC Part Number=C2689964, Manufacturer="Korean Hroparts Elec", Package=Custom, ComponentLink1Description=LCSC, ComponentLink1URL=https://www.lcsc.com/product-detail/USB-Connectors_Korean-Hroparts-Elec-TYPE-C-31-D-06_C2689964.html, Item Type="USB Connector", Manufacturer Part Number=TYPE-C-31-D-06
J15: "MACHINE PIN SOCKET 5P 2.54MM PIT", LCSC Part Number=C3320109, Manufacturer="Adam Equipment", Supplier Part Number 1=2057-SMC-1-05-1-GT-ND, Item Type="Pin Header", Manufacturer Part Number=SMC-1-05-1-GT, Pricing 1="1=0.41000, 10=0.38500, 25=0.33040, 50=0.28080, 100=0.26970, 250=0.24224, 500=0.23120, 1000=0.19268, 2500=0.17616 (USD)", RoHS=No, Stock 1=1697, Supplier 1=Digi-Key
LED1: "20mA White Diffused -40℃~+85℃ RGB SMD5050 Light Emitting Diodes (LED) ROHS", LCSC Part Number=C409780, Manufacturer=MEIHUA, Package=SMD5050, ComponentLink1Description=LCSC, ComponentLink1URL=https://www.lcsc.com/product-detail/Light-Emitting-Diodes-LED_MEIHUA-MHP5050RGBDT_C409780.html, Item Type="RGB LED", Manufacturer Part Number=MHP5050RGBDT
Q1 Q2: "TRANS NPN 40V 0.6A SMD SOT23-3", Case/Package=SOT-23, Collector Base Voltage (VCBO)=75V, Collector Emitter Breakdown Voltage=40V, Collector Emitter Saturation Voltage=1V, Continuous Collector Current=600mA, Current=1A, Emitter Base Voltage (VEBO)=6V, Frequency=300MHz, LCSC Part Number=C94515, Manufacturer=Diodes, Max Operating Temperature=150°C, Max Power Dissipation=300mW, Min Operating Temperature=-55°C, Package Quantity=3000, Power Dissipation=350mW, Supplier Part Number 1=MMBT2222A-FDIDKR-ND, Collector Emitter Voltage (VCEO)=40V, ComponentLink1Description=http://www.diodes.com/datasheets/ds30041.pdf?src-supplier=Future+Electronics, ComponentLink1URL=http://www.diodes.com/datasheets/ds30041.pdf?src-supplier=Future+Electronics, ComponentLink2Description=http://www.diodes.com/datasheets/ds30041.pdf?src-supplier=Avnet, ComponentLink2URL=http://www.diodes.com/datasheets/ds30041.pdf?src-supplier=Avnet, ComponentLink3Description=https://www.verical.com/server-webapp/html/getDatasheet?partID=82692&src-supplier=Verical, ComponentLink3URL=https://www.verical.com/server-webapp/html/getDatasheet?partID=82692&src-supplier=Verical, ComponentLink4Description=https://www.diodes.com/assets/Datasheets/ds30041.pdf?src-supplier=Digi-Key, ComponentLink4URL=https://www.diodes.com/assets/Datasheets/ds30041.pdf?src-supplier=Digi-Key, ComponentLink5Description=http://www.diodes.com/datasheets/ds30041.pdf?src-supplier=Avnet+Europe, ComponentLink5URL=http://www.diodes.com/datasheets/ds30041.pdf?src-supplier=Avnet+Europe, ComponentLink6Description=http://www.diodes.com/datasheets/ds30041.pdf?src-supplier=Element14, ComponentLink6URL=http://www.diodes.com/datasheets/ds30041.pdf?src-supplier=Element14, Contact Plating=Matte,Tin, Current Rating=600mA, Element Configuration=Single, Gain Bandwidth Product=300MHz, Height=1mm, hFE Min=100, Item Type=Mosfet, Lead Free="Lead Free", Length=3.05mm, Manufacturer Part Number=MMBT2222A-7-F, Max Breakdown Voltage=40V, Max Collector Current=600mA, Max Frequency=300MHz, Mount="Surface Mount", Number of Elements=1, Number of Pins=3, Packaging="Tape and Reel", Polarity=NPN, Pricing 1="1=0.15, 10=0.134, 100=0.0729, 500=0.04486, 1000=0.03059 (USD)", Radiation Hardening=No, REACH SVHC="No SVHC", Stock 1=2471182, Supplier 1=Digi-Key, Termination=SMD/SMT, Transition Frequency=300MHz, Voltage=40V, Voltage Rating (DC)=40V, Weight=0.000282oz, Width=1.4mm
R1 R2 R3 R16 R22: library part RC0402FR-0710KL, "RES 10K OHM 1% 1/16W 0402", Case Code (Imperial)=0402, Case Code (Metric)=1005, LCSC Part Number=C60490, Manufacturer=Yageo, Max Operating Temperature=155°C, Max Power Dissipation=63mW, Min Operating Temperature=-55°C, Power Rating=62.5mW, Resistance=10kR, Resistance Tolerance=1%, Resistor Type="Thick Film", Supplier Part Number 1=603-RC0402FR-0710KL, Temperature Coefficient=100ppm/°C, Voltage Rating=50V, Case/Package=0402, Category="Chip SMD Resistors", ComponentLink1Description=https://datasheet.ciiva.com/7660/38568-7660787.pdf?src-supplier=Element14, ComponentLink1URL=https://datasheet.ciiva.com/7660/38568-7660787.pdf?src-supplier=Element14, ComponentLink2Description=https://datasheet.ciiva.com/7849/1686128-7849814.pdf?src-supplier=Element14, ComponentLink2URL=https://datasheet.ciiva.com/7849/1686128-7849814.pdf?src-supplier=Element14, ComponentLink3Description=https://datasheet.ciiva.com/7983/1018594-7983486.pdf?src-supplier=Element14, ComponentLink3URL=https://datasheet.ciiva.com/7983/1018594-7983486.pdf?src-supplier=Element14, ComponentLink4Description=https://datasheet.ciiva.com/22747/1018594-22747512.pdf?src-supplier=Element14, ComponentLink4URL=https://datasheet.ciiva.com/22747/1018594-22747512.pdf?src-supplier=Element14, ComponentLink5Description=https://datasheet.ciiva.com/12667/pyu-rc0402-51-rohs-l-6-r-12667067.pdf?src-supplier=Mouser, ComponentLink5URL=https://datasheet.ciiva.com/12667/pyu-rc0402-51-rohs-l-6-r-12667067.pdf?src-supplier=Mouser, ComponentLink6Description=https://datasheet.ciiva.com/7849/1784430-7849813.pdf?src-supplier=Element14, ComponentLink6URL=https://datasheet.ciiva.com/7849/1784430-7849813.pdf?src-supplier=Element14, ComponentLink7Description=https://datasheet.ciiva.com/7849/1784430-7849815.pdf?src-supplier=Element14, ComponentLink7URL=https://datasheet.ciiva.com/7849/1784430-7849815.pdf?src-supplier=Element14, Construction=Rectangular, Depth=0.5mm, Features="Moisture Resistant", Height=0.32mm, Item Type=Resistor, Lead Free="Lead Free", Lead Pitch=0.2mm, Length=1mm, Manufacturer Part Number=RC0402FR-0710KL, Military Standard=Not, Number of Pins=2, Number of Terminations=2, Packaging="Tape and Reel", Pricing 1="1=0.10000, 10=0.01400, 50=0.01400, 100=0.00500, 1000=0.00300, 10000=0.00200 (USD)", REACH SVHC="No SVHC", RoHS=Yes, RoHS Compliant=Yes, Series=RC, Stock 1=18648329, Supplier 1=Mouser, Termination=SMD/SMT, Tolerance=1%, Voltage Rating (DC)=50V, Width=0.5mm, Working Voltage=50V
R4: library part RT0603BRB072K2L, "RES SMD 2.2K OHM 0.1% 1/10W 0603", Case Code (Imperial)=0603, Case Code (Metric)=1608, LCSC Part Number=C860297, Manufacturer=Yageo, Max Operating Temperature=155°C, Max Power Dissipation=100mW, Min Operating Temperature=-55°C, Supplier Part Number=YAG2182CT-ND, Temperature Coefficient=10ppm/°C, Tolerance=0.1%, Case/Package=0603, Category="Chip SMD Resistors", ComponentLink1Description=http://www.yageo.com/documents/recent/PYu-RT_1-to-0.01_RoHS_L_7.pdf?src-supplier=Digi-Key, ComponentLink1URL=http://www.yageo.com/documents/recent/PYu-RT_1-to-0.01_RoHS_L_7.pdf?src-supplier=Digi-Key, ComponentLink2Description=http://www.yageo.com/documents/recent/PYu-RT_1-to-0.01_RoHS_L_9.pdf?src-supplier=Digi-Key, ComponentLink2URL=http://www.yageo.com/documents/recent/PYu-RT_1-to-0.01_RoHS_L_9.pdf?src-supplier=Digi-Key, Item Type=Resistor, Manufacturer Part Number=RT0603BRB072K2L, Number of Terminations=2, Packaging="Cut Tape", Pricing="1=0.6, 10=0.446, 50=0.3148, 100=0.2597, 500=0.1836, 1000=0.14563 (USD)", RoHS=Yes, RoHS Compliant=Yes, Series=RT, Stock=518, Supplier=Digi-Key
R5 R7 R9 R10 R11 R12: library part RT0603BRD076K34L, "RES SMD 6.34KOHM 0.1% 1/10W 0603", Case Code (Imperial)=0603, Case Code (Metric)=1608, LCSC Part Number=C861532, Manufacturer=Yageo, Max Operating Temperature=125°C, Min Operating Temperature=-55°C, Power Rating=100mW, Resistance=6.34kR, Supplier Part Number 1=YAG4590CT-ND, Temperature Coefficient=25ppm/°C, Tolerance=0.1%, Voltage Rating=75V, Voltage Rating (DC)=50V, Case/Package=0603, Category="Chip SMD Resistors", ComponentLink1Description=https://datasheet.ciiva.com/12811/pyu-rt-1-to-0-05-rohs-l-4-12811741.pdf?src-supplier=Mouser, ComponentLink1URL=https://datasheet.ciiva.com/12811/pyu-rt-1-to-0-05-rohs-l-4-12811741.pdf?src-supplier=Mouser, Height=0.45mm, Item Type=Resistor, Lead Free="Lead Free", Length=1.6mm, Manufacturer Part Number=RT0603BRD076K34L, Packaging="Tape and Reel", Pricing 1="1=0.34000, 10=0.28800, 100=0.11260, 500=0.06812, 1000=0.04716, 2500=0.04322 (USD)", RoHS=Yes, RoHS Compliant=Yes, Series=RT, Stock 1=15385, Supplier 1=Digi-Key, Termination=SMD/SMT, Weight=7.1E-05oz, Width=0.8mm